# Altium PCB DXES101B-659637.PcbDoc (part 1 of 2)
Units mm, origin at the board's own origin, x right, y up, seen from the top; angles counter-clockwise.
Board outline 125 x 80 mm, 4 copper layers (Top Layer, Layer 1, Layer 2, Bottom Layer), stack 1.883 mm thick; 290 components, 208 nets, 784 pads, 192 vias.
Unrouted connection lines stored in the file: 554.
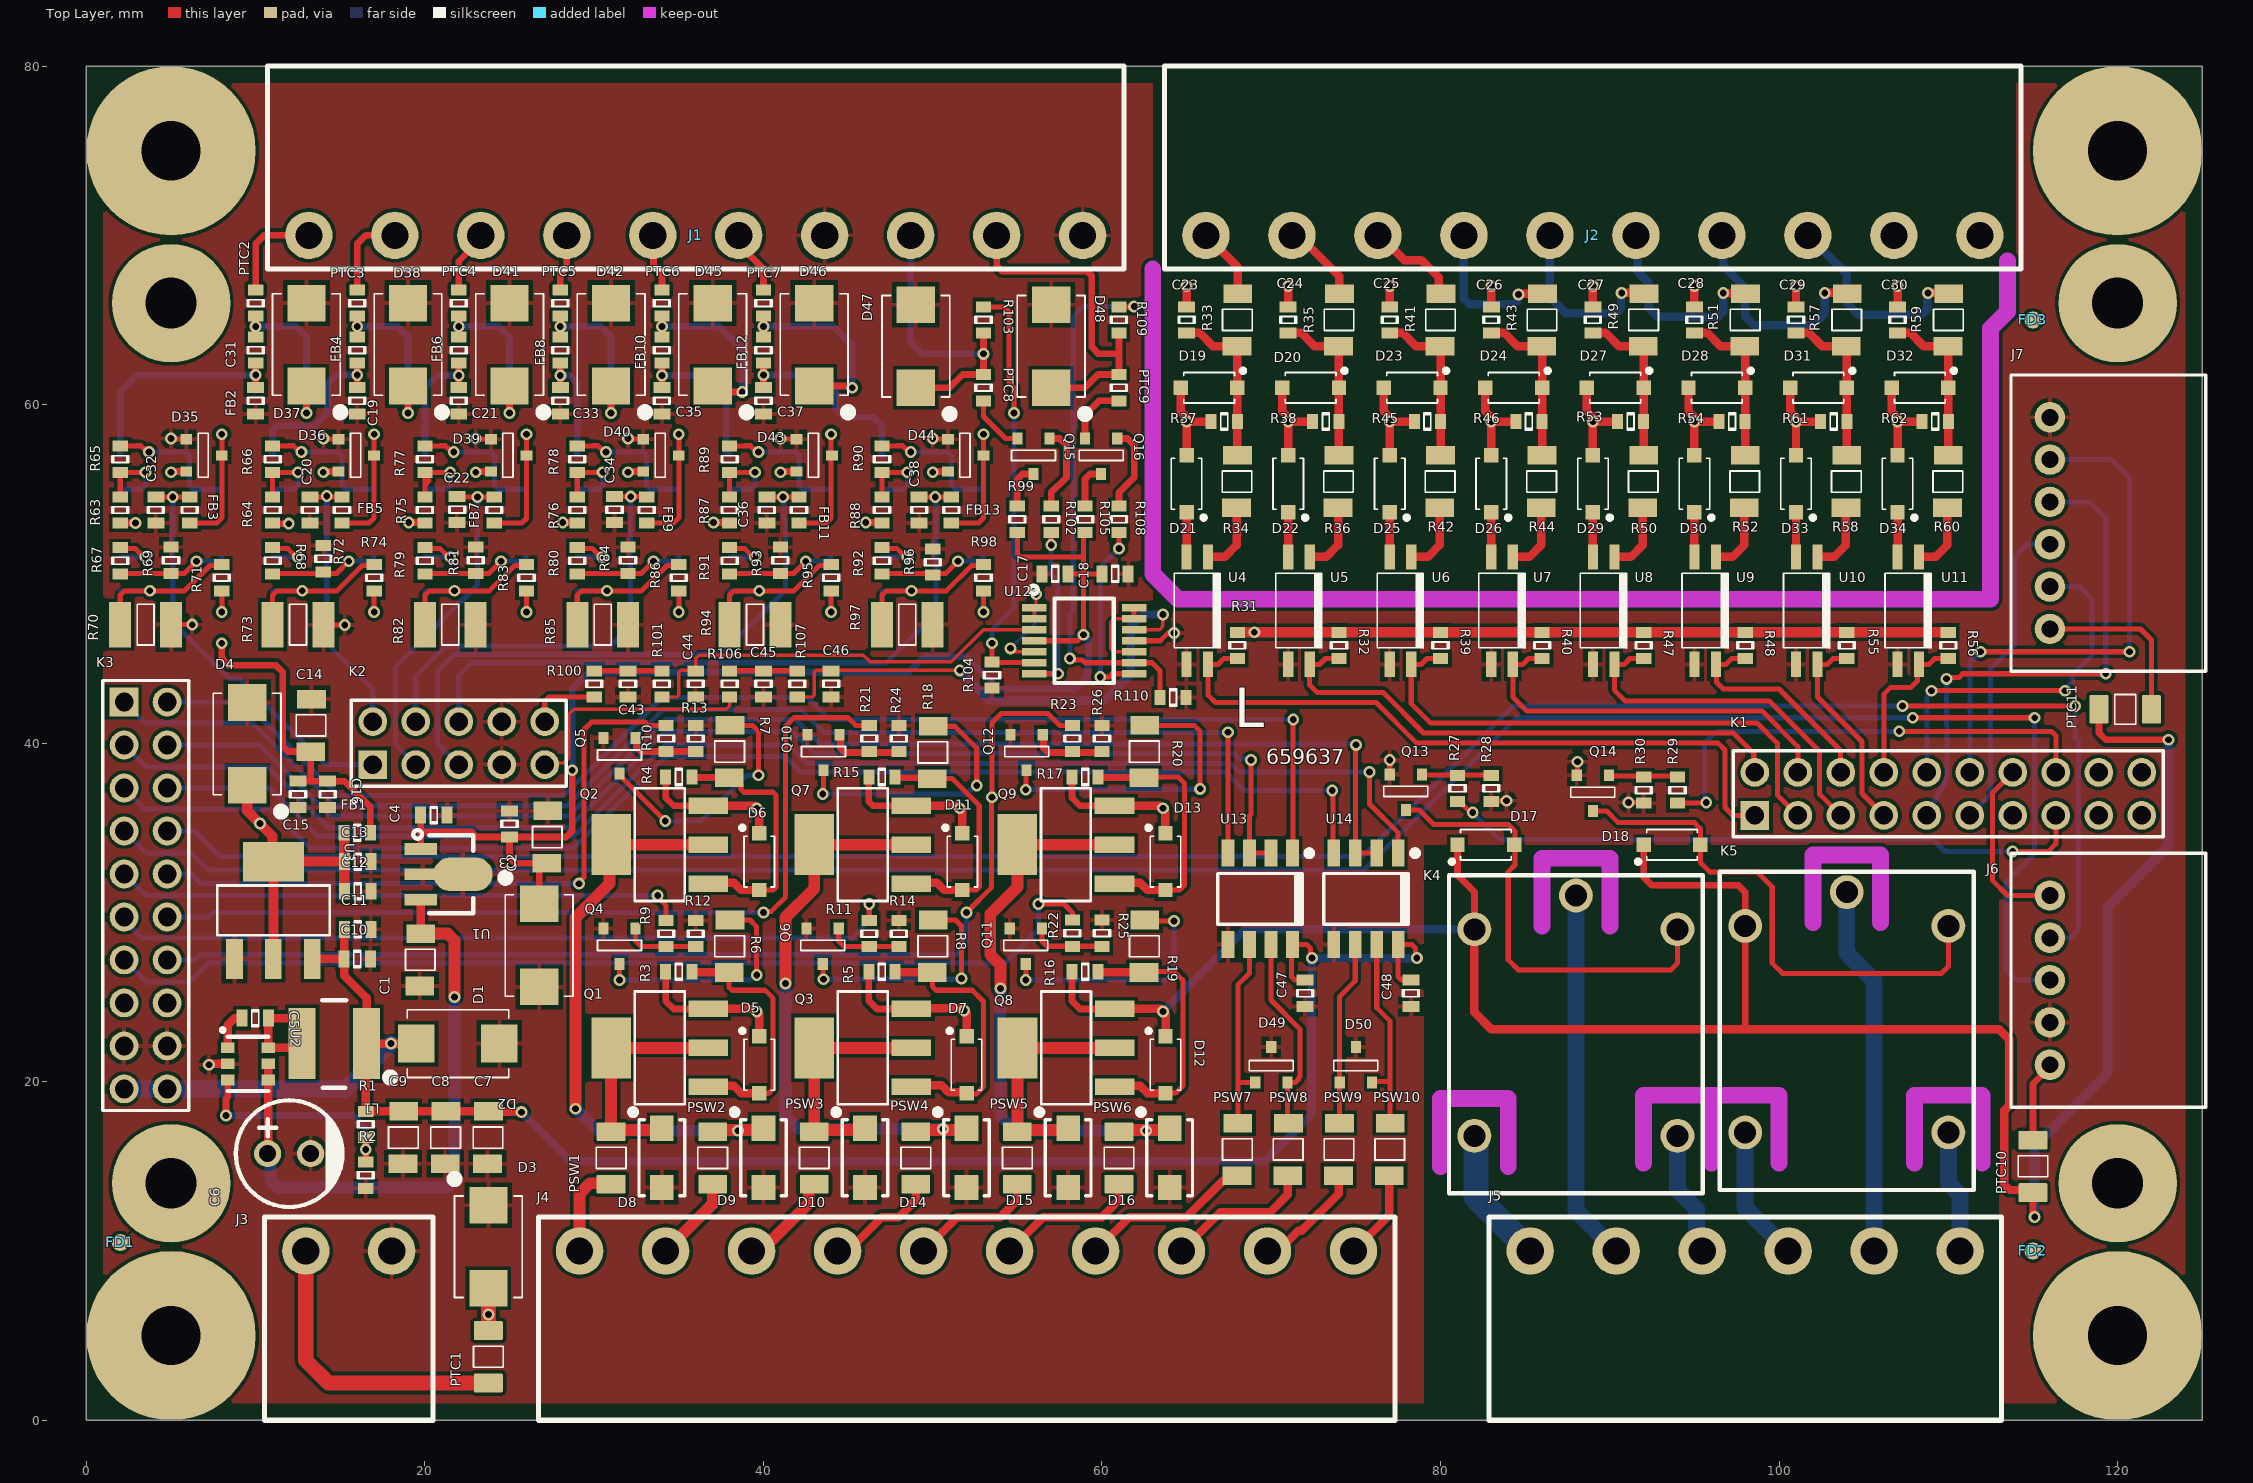
[diagram p0: Top Layer view]
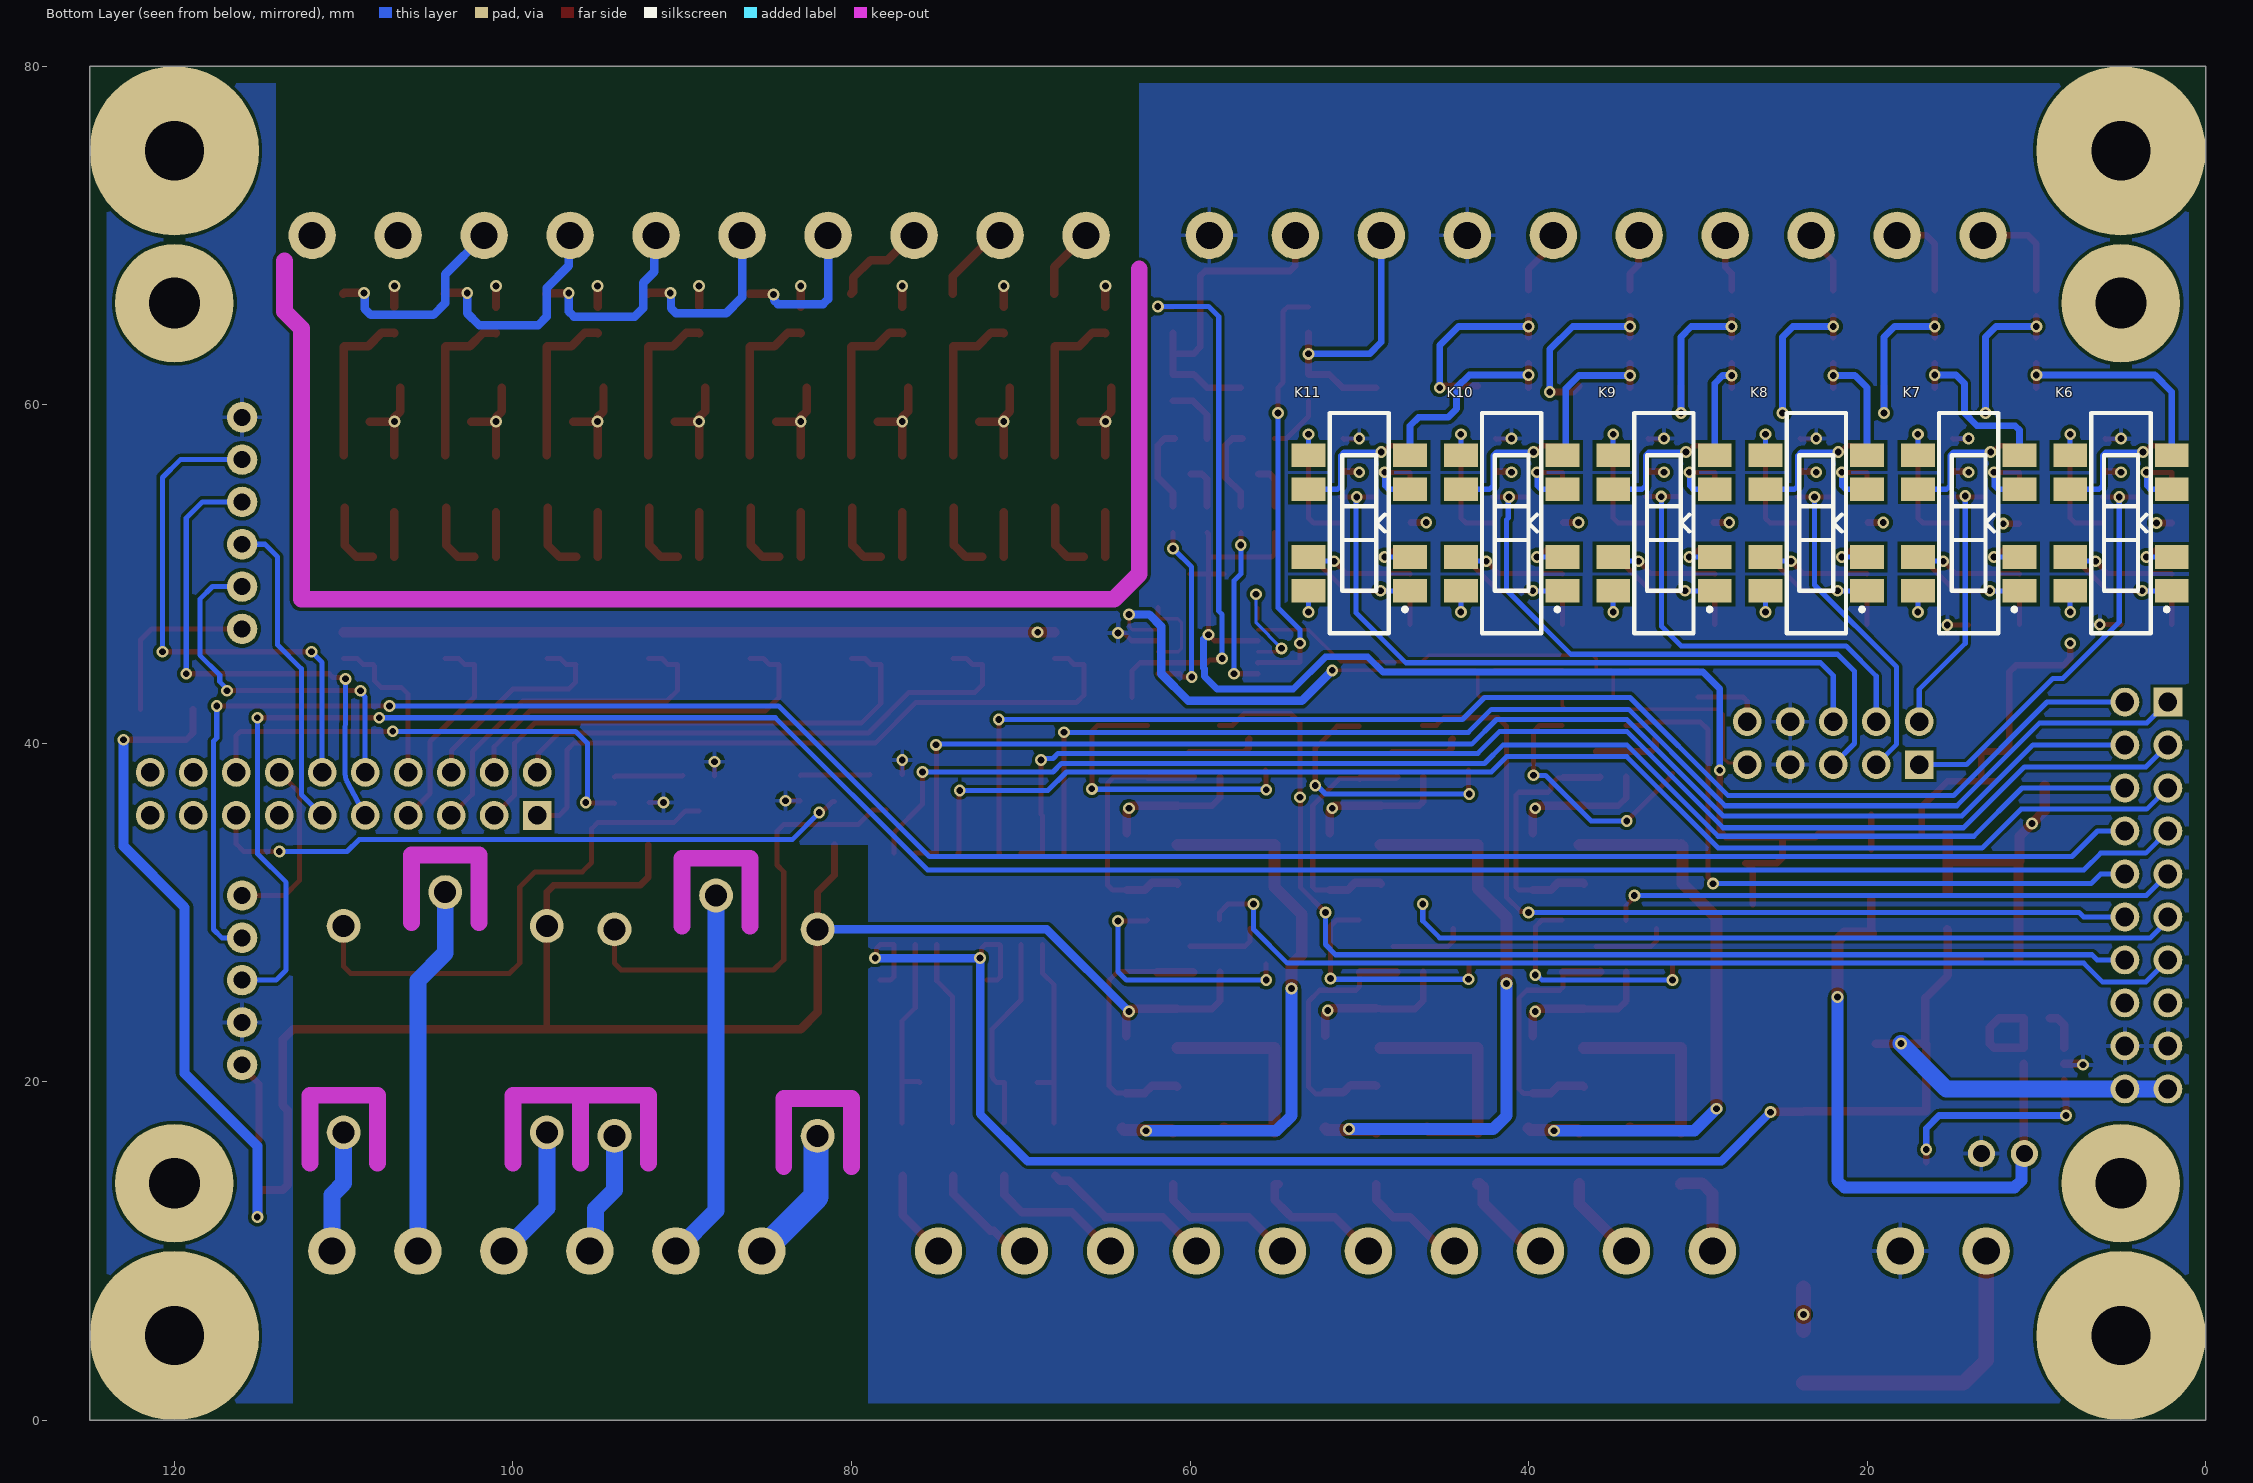
[diagram p1: Bottom Layer view, seen from below]
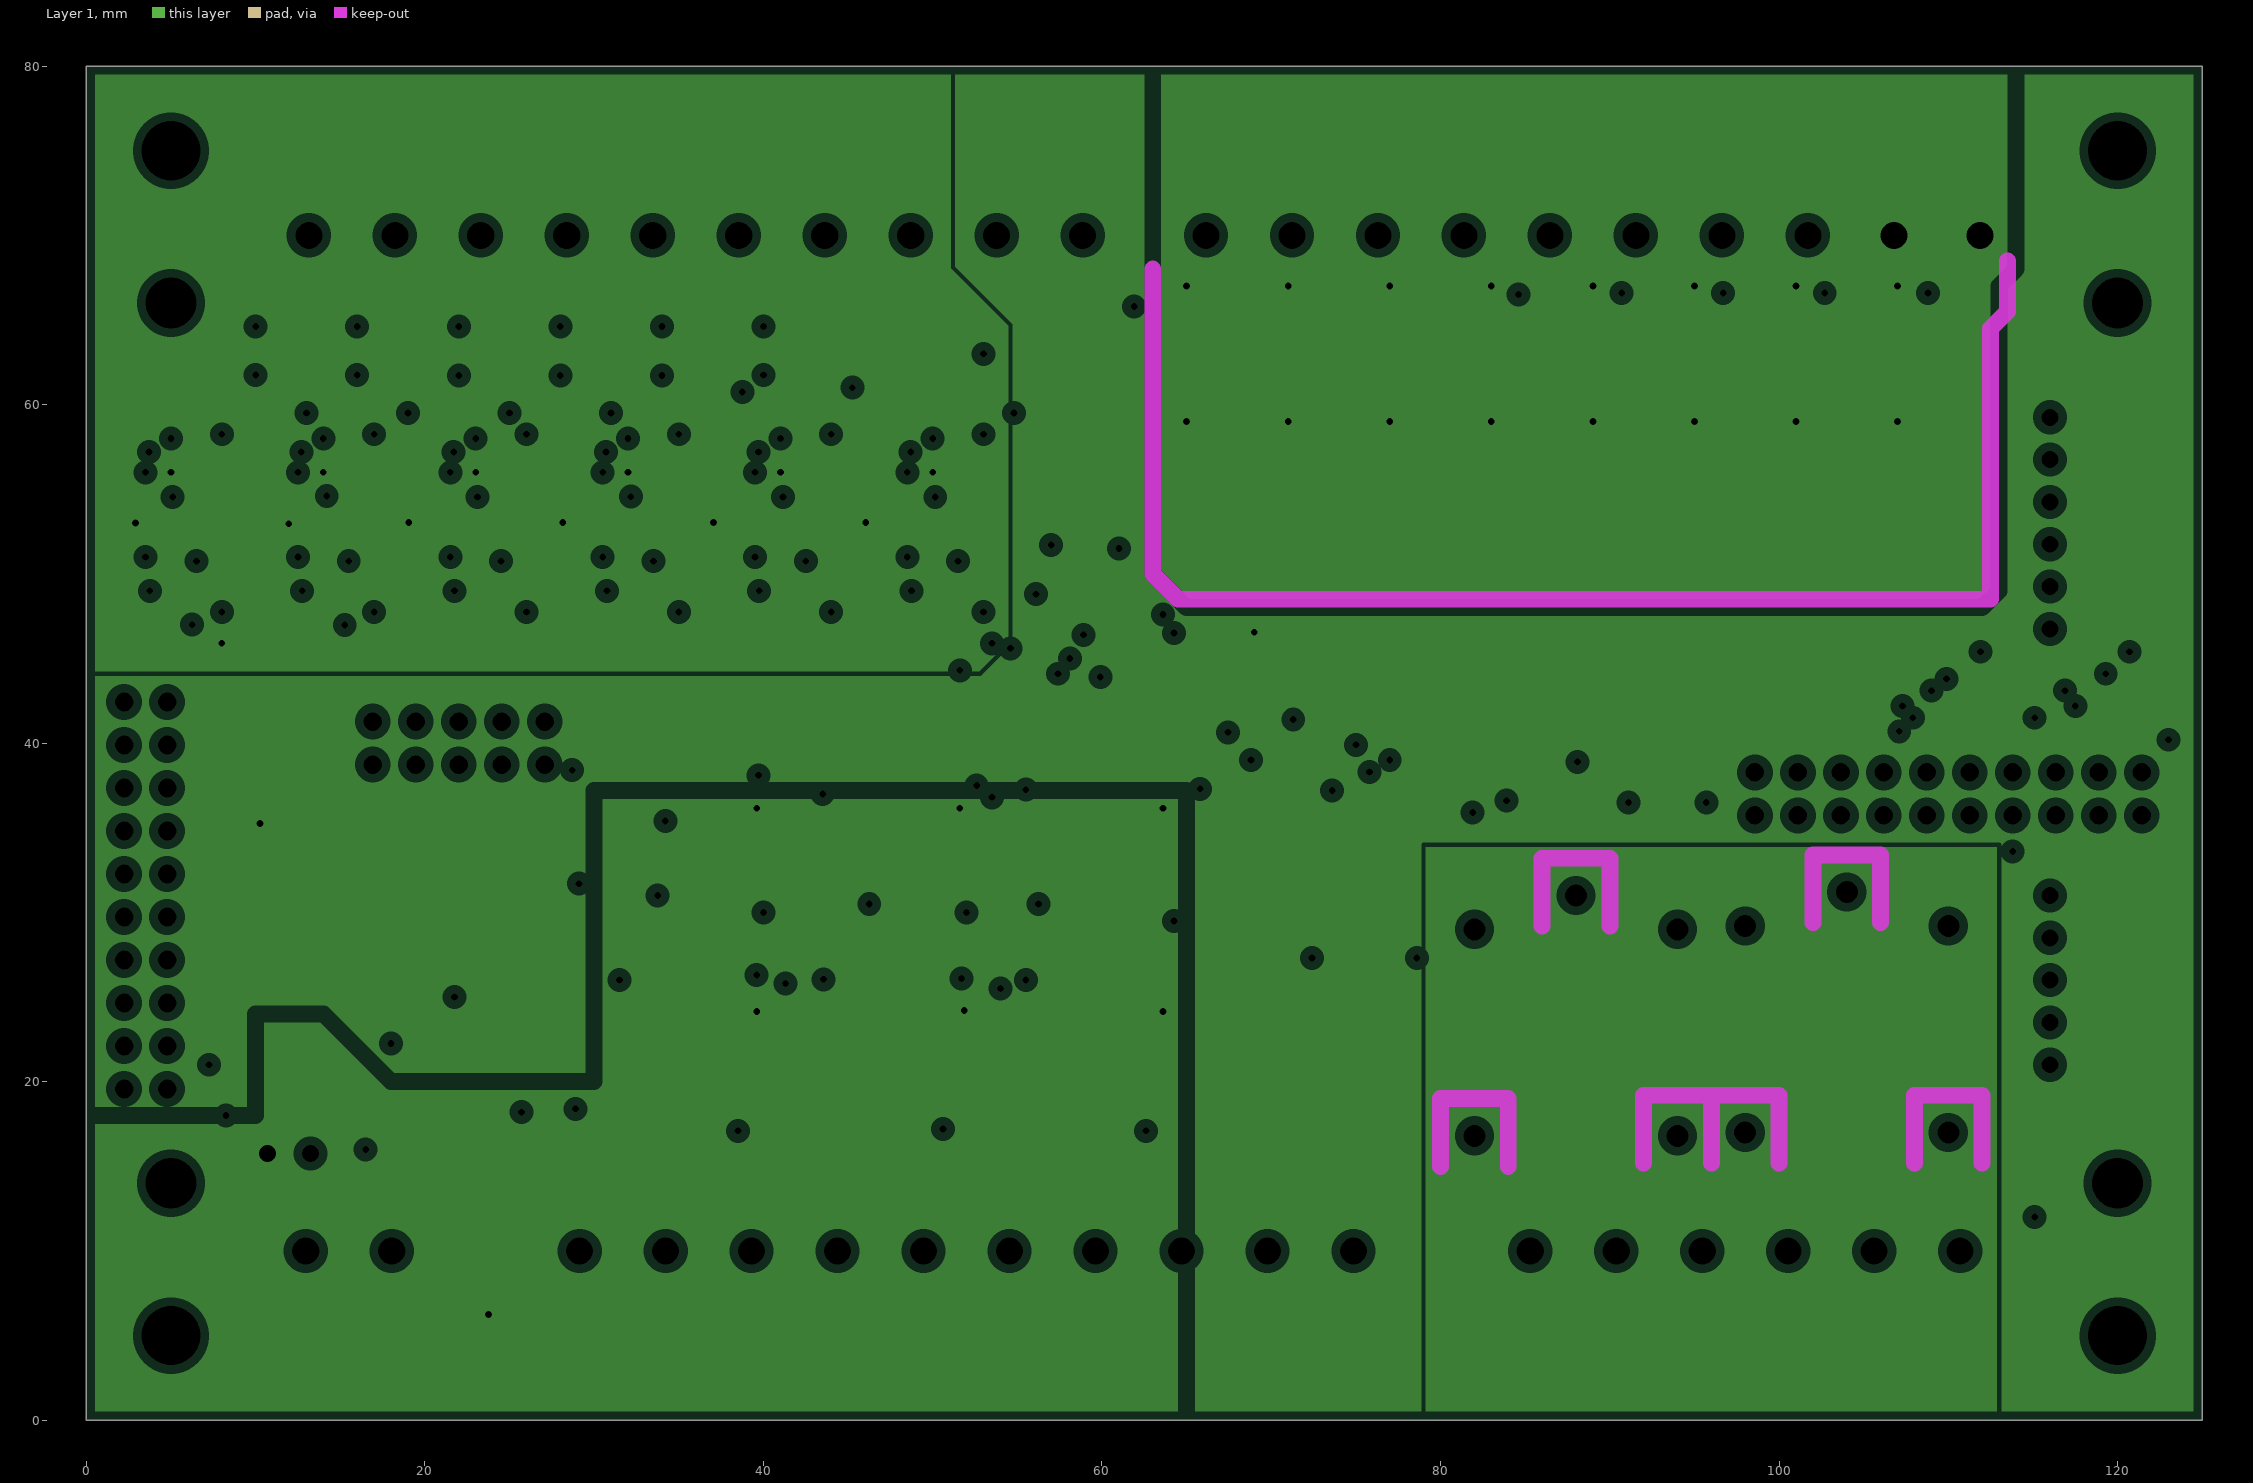
[diagram p2: Layer 1, clearances drawn from the general rule]
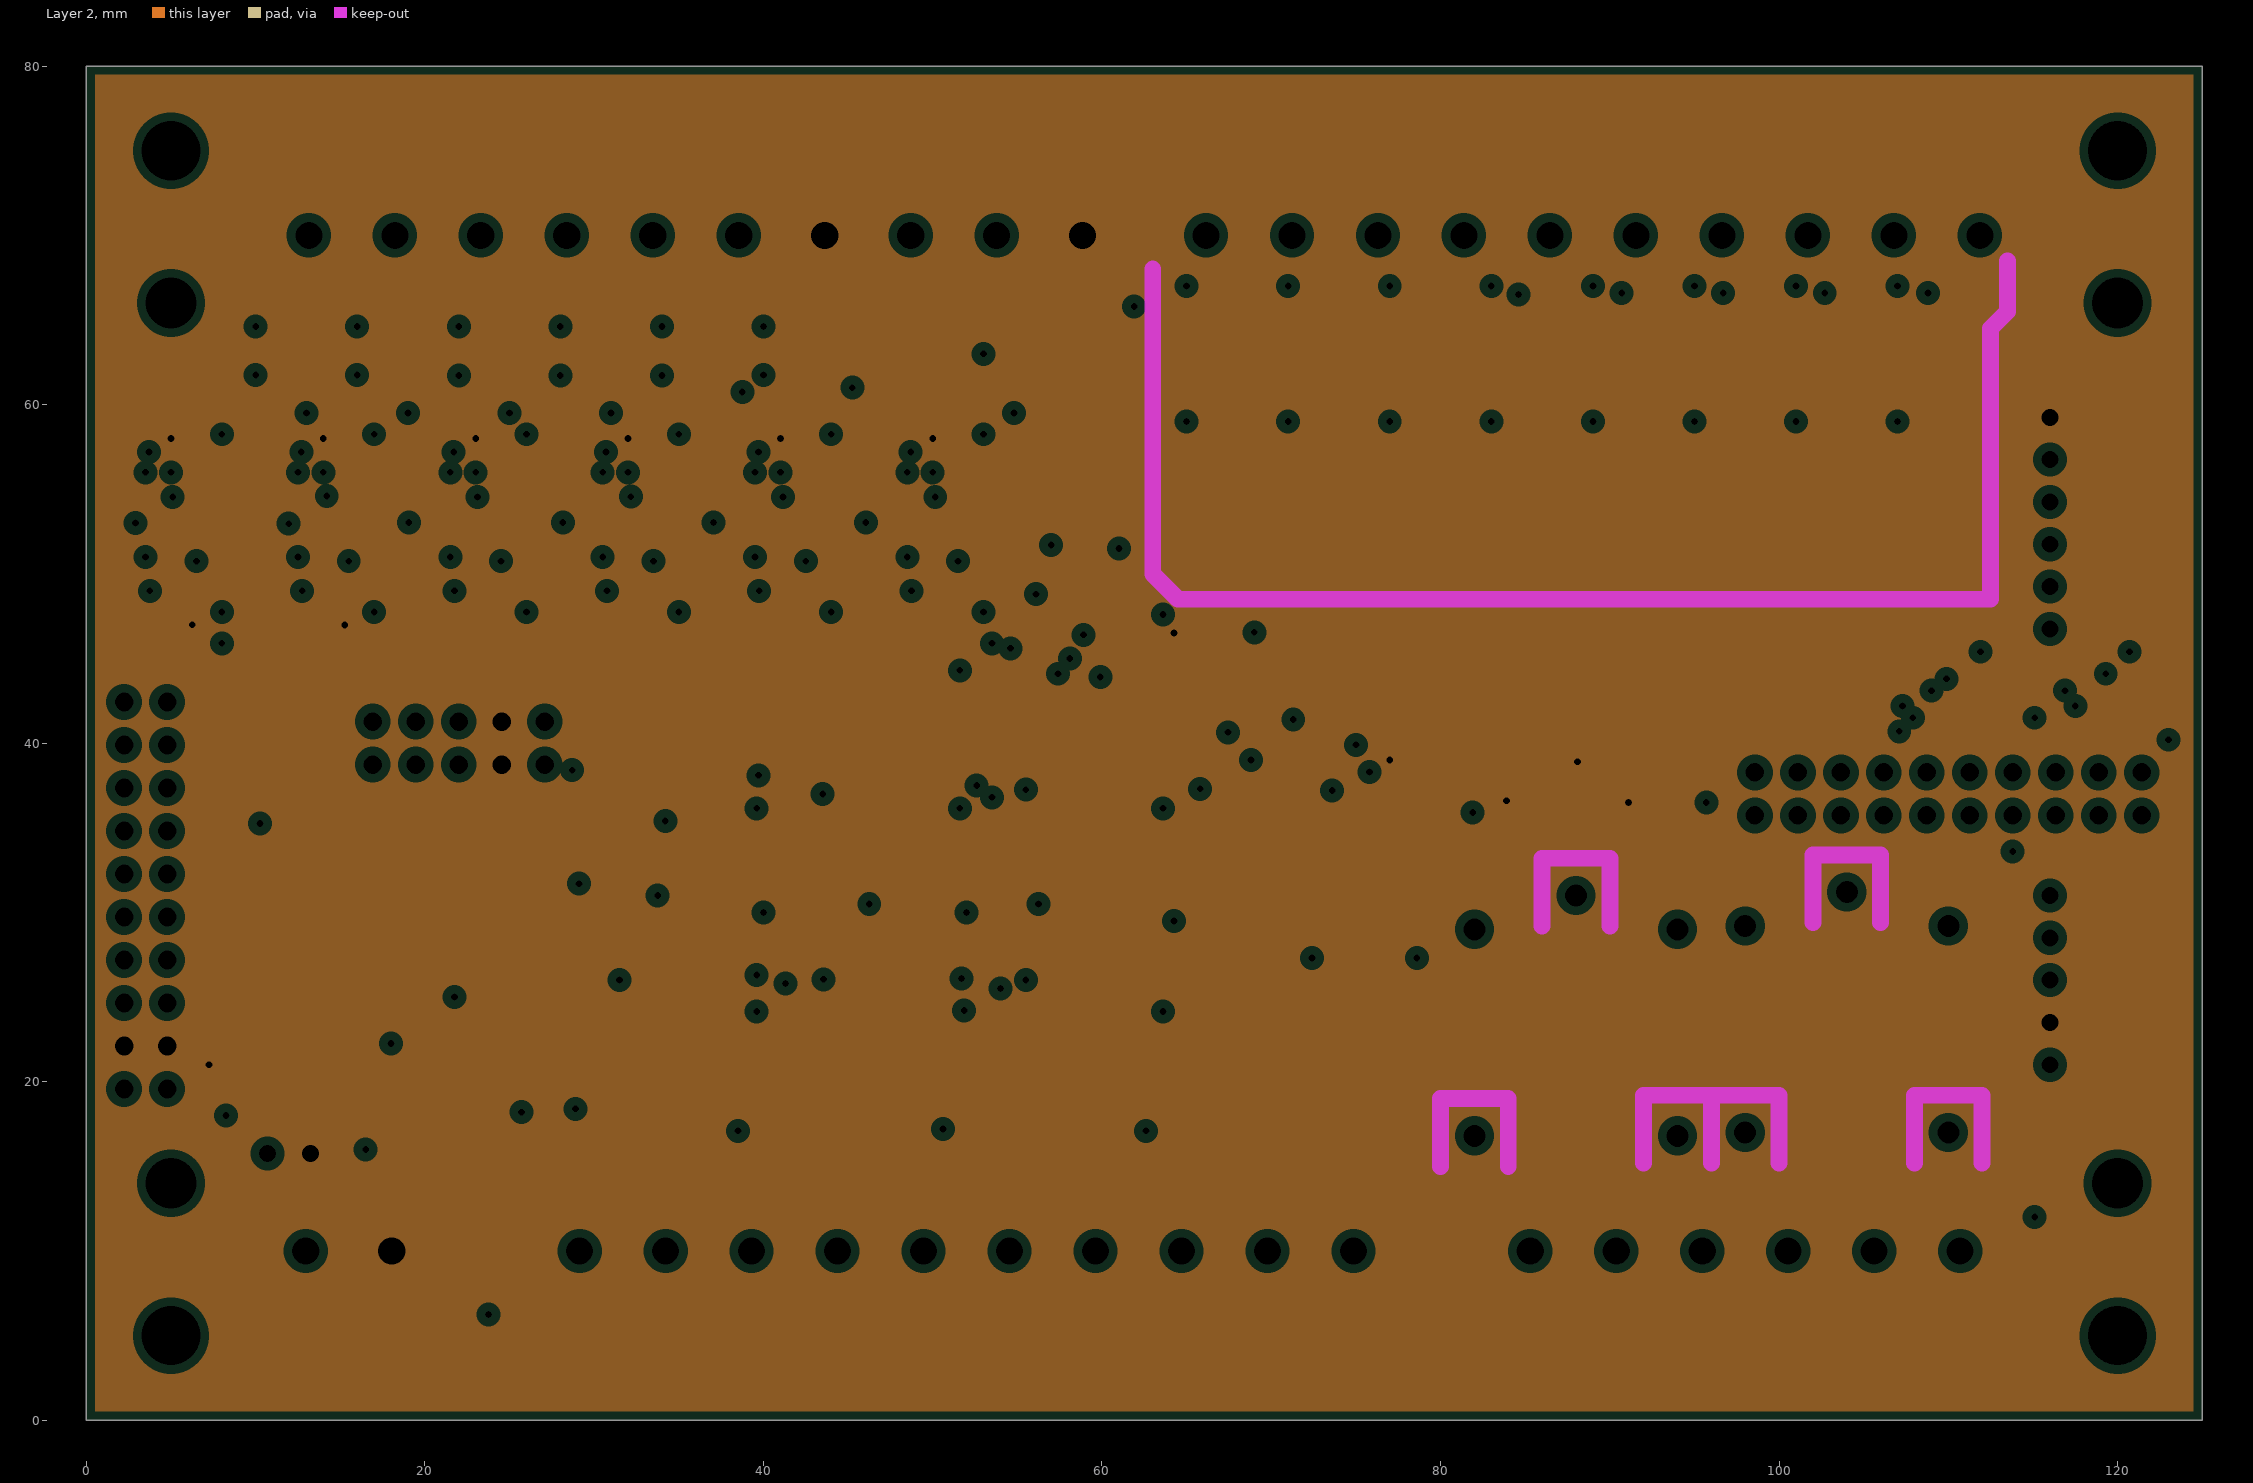
[diagram p3: Layer 2, clearances drawn from the general rule]
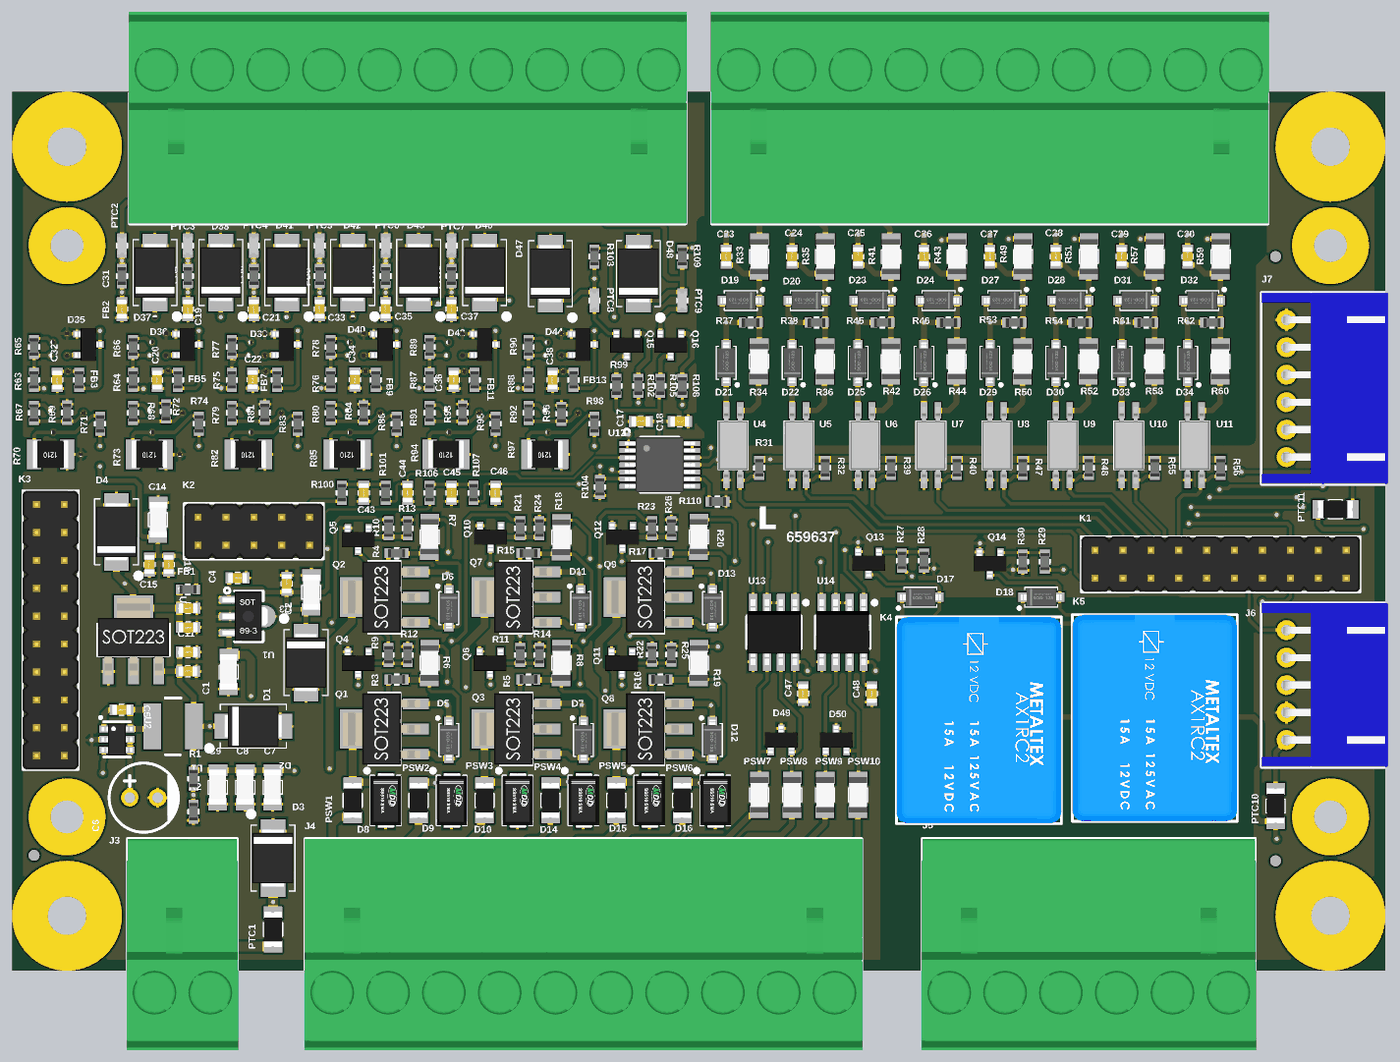
[diagram p5: 3D render of the assembled board from above, using the file's embedded part models]
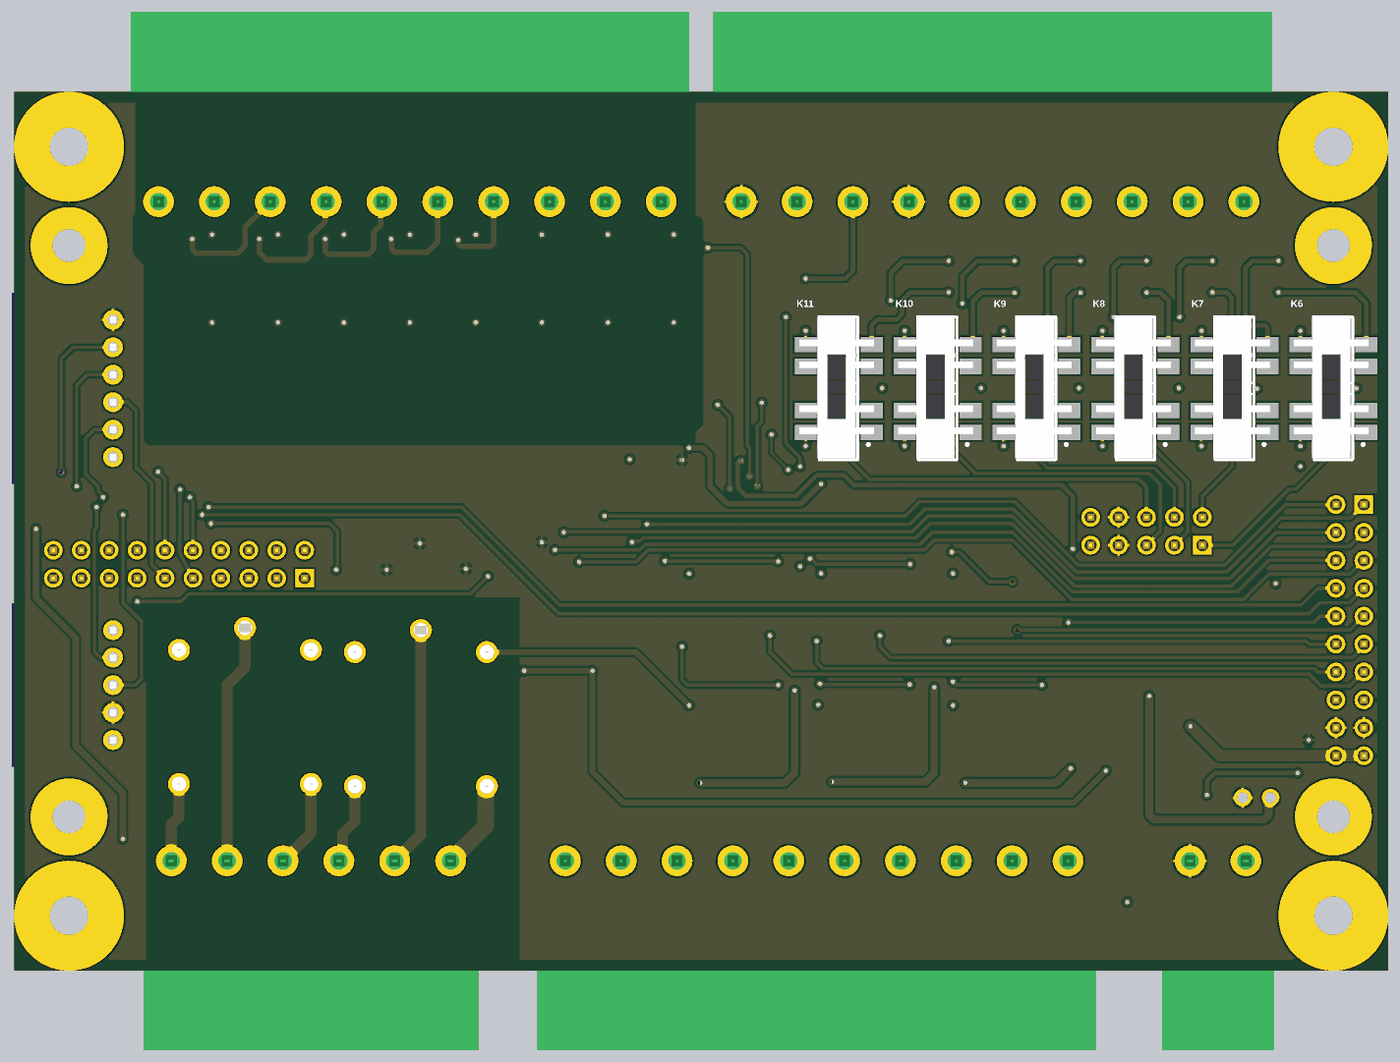
[diagram p6: 3D render of the assembled board from below, using the file's embedded part models]

## Layer stack, top to bottom
Top Solder: solder mask 0.0102, Solder Resist, Dk 3.5
Top Layer: signal copper 0.0356
Dielectric 2: prepreg 0.0711, PP-006, Dk 4.1
Layer 1: plane copper 0.035, net (Multiple Nets)
Dielectric 1: dielectric 1.6, FR-4, Dk 4.8
Layer 2: plane copper 0.035, net GND
Dielectric 3: prepreg 0.0711, PP-006, Dk 4.1
Bottom Layer: signal copper 0.0356
Bottom Solder: solder mask 0.0102, Solder Resist, Dk 3.5

## Board outline
0,0 0,80 125,80 125,0

## Design rules (kind name [scope] priority, off if disabled: settings)
BoardOutlineClearance [All] p1: gap=1 ignorepadtopadclearanceinfootprint=FALSE except(0: Arc-SplitContinuation Track-SplitContinuation SMDPad-SplitContinuation THPad-SplitContinuation Via-SplitContinuation Fill-SplitContinuation Poly-SplitContinuation Text-SplitContinuation)
Clearance [All] p1: gap=0.2 ignorepadtopadclearanceinfootprint=FALSE
ComponentClearance [All] p1: gap=0.254 collisioncheckmode=3 verticalgap=2540 showdistances=FALSE
PlaneClearance [All] p1: clearance=0.508
PlaneConnect [All] p1: planeconnectstyle=Relief reliefexpansion=0.508 reliefentries=4 reliefconductorwidth=0.254 reliefairgap=0.254
PolygonConnect [All] p1: connectstyle=Relief reliefconductorwidth=0.254 reliefentries=4 polygonreliefangle="90 Angle" airgapwidth=0.254
RoutingVias [All] p1: holewidth=0.4 width=0.7 viastyle="Through Hole" minholewidth=0.4 minwidth=0.7 maxholewidth=0.4 maxwidth=0.7
SolderMaskExpansion [All] p1: expansion=0.102 istentingtop=FALSE
SupplyNets "Schematic Supply Nets_7" [InNet('GND')] p1: voltage=0.000
SupplyNets "Schematic Supply Nets_6" [InNet('3,3VA')] p2: voltage=0.000
SupplyNets "Schematic Supply Nets_5" [InNet('5V')] p3: voltage=0.000
SupplyNets "Schematic Supply Nets_4" [InNet('VSYS')] p4: voltage=0.000
SupplyNets "Schematic Supply Nets_3" [InNet('GND_ISO')] p5: voltage=0.000
SupplyNets "Schematic Supply Nets_2" [InNet('VSYSIN')] p6: voltage=0.000
SupplyNets "Schematic Supply Nets_1" [InNet('3,3V')] p7: voltage=0.000
SupplyNets "Schematic Supply Nets" [InNet('15V')] p8: voltage=0.000
Width [All] p1: maxlimit=3 minlimit=0.2 preferedwidth=0.2
27 further rules are at their usual default settings.

## Classes and differential pairs
component class RELAY-OUTPUTS: D17 D18 K4 K5 Q13 Q14 R27 R28 R29 R30
component class MODEM_COMM_pORT: J7 PTC11
component class DXES101B-659637-GENERAL: J1 J2 J3 J4 J5
component class DIGITAL_OUTPUTS: D5 D6 D7 D8 D9 D10 D11 D12 D13 D14 D15 D16 PSW1 PSW2 PSW3 PSW4 PSW5 PSW6 Q1 Q2 Q3 Q4 Q5 Q6 Q7 Q8 Q9 Q10 Q11 Q12 R3 R4 R5 R6 R7 R8 R9 R10 R11 R12 R13 R14 R15 R16 R17 R18 R19 R20 R21 R22 R23 R24 R25 R26
component class DEXTRO_EXTBUS: J6 PTC10
component class Designator: C23 C24 C25 C26 C27 C28 C29 C30 D19 D20 D21 D22 D23 D24 D25 D26 D27 D28 D29 D30 D31 D32 D33 D34 R31 R32 R33 R34 R35 R36 R37 R38 R39 R40 R41 R42 R43 R44 R45 R46 R47 R48 R49 R50 R51 R52 R53 R54 R55 R56 R57 R58 R59 R60 R61 R62 U4 U5 U6 U7 U8 U9 U10 U11
component class CPU_HEADER: C1 C2 C3 C4 C5 C6 C7 C8 C9 C10 C11 C12 C13 C14 C15 C16 D1 D2 D3 D4 FB1 FD1 FD2 FD3 K1 K2 K3 L1 PTC1 R1 R2 U1 U2 U3
component class COMM_PORTS: C47 C48 D49 D50 PSW7 PSW8 PSW9 PSW10 U13 U14
component class ANALOG_OUTPUTS: C17 C18 C43 C44 C45 C46 D47 D48 PTC8 PTC9 Q15 Q16 R99 R100 R101 R102 R103 R104 R105 R106 R107 R108 R109 R110 U12
component class ANALOG_INPUTS: C19 C20 C21 C22 C31 C32 C33 C34 C35 C36 C37 C38 D35 D36 D37 D38 D39 D40 D41 D42 D43 D44 D45 D46 FB2 FB3 FB4 FB5 FB6 FB7 FB8 FB9 FB10 FB11 FB12 FB13 K6 K7 K8 K9 K10 K11 PTC2 PTC3 PTC4 PTC5 PTC6 PTC7 R63 R64 R65 R66 R67 R68 R69 R70 R71 R72 R73 R74 R75 R76 R77 R78 R79 R80 R81 R82 R83 R84 R85 R86 R87 R88 R89 R90 R91 R92 R93 R94 R95 R96 R97 R98

## Components (designator, comment, footprint, x,y, rotation, side; value= is the part's Value field where it differs from the comment)
C1 "22uF/25V" CAP-1206 19.725,27.2 r90 top
C2 "22uF/25V" CAP-1206 27.225,34.45 r270 top
C3 "10uF/16V" CAP-0603 25,35.225 r270 top
C4 "10uF/16V" CAP-0603 20.525,35.75 r180 top
C5 "100nF/50V" CAP-0603 9.975,23.75 r180 top
C6 "100uF/35V" CAP-TH_BD6.3-P2.50-D1.0-FD 11.98,15.75 r0 top
C7 "22uF/25V" CAP-1206 23.725,16.7 r90 top
C8 "22uF/25V" CAP-1206 21.225,16.7 r90 top
C9 "22uF/25V" CAP-1206 18.725,16.7 r90 top
C10 "10uF/16V" CAP-0603 16,27.25 r180 top
C11 "100nF/50V" CAP-0603 16.025,29 r180 top
C12 "10uF/16V" CAP-0603 16.025,31.25 r180 top
C13 "100nF/50V" CAP-0603 16.025,33 r180 top
C14 "22uF/25V" CAP-1206 13.275,41.05 r270 top
C15 "10uF/16V" CAP-0603 12.5,36.975 r90 top
C16 "100nF/50V" CAP-0603 14.25,36.975 r90 top
C17 "10uF/16V" CAP-0603 57.225,50 r0 top
C18 "100nF/50V" CAP-0603 60.775,50 r180 top
C19 "100nF/50V" CAP-0603 16,60.225 r90 top
C20 "100nF/50V" CAP-0603 13.2,53.775 r90 top
C21 "100nF/50V" CAP-0603 22,60.225 r90 top
C22 "100nF/50V" CAP-0603 21.9,53.8 r90 top
C23 "100nF/50V" CAP-0603 65,65 r270 top
C24 "100nF/50V" CAP-0603 71,65 r270 top
C25 "100nF/50V" CAP-0603 77,65 r270 top
C26 "100nF/50V" CAP-0603 83,65 r270 top
C27 "100nF/50V" CAP-0603 89,65 r270 top
C28 "100nF/50V" CAP-0603 95,65 r270 top
C29 "100nF/50V" CAP-0603 101,65 r270 top
C30 "100nF/50V" CAP-0603 107,65 r270 top
C31 "100nF/50V" CAP-0603 10,60.225 r90 top
C32 "100nF/50V" CAP-0603 4.1,53.775 r90 top
C33 "100nF/50V" CAP-0603 28,60.225 r90 top
C34 "100nF/50V" CAP-0603 31.2,53.8 r90 top
C35 "100nF/50V" CAP-0603 34,60.225 r90 top
C36 "100nF/50V" CAP-0603 40.2,53.775 r90 top
C37 "100nF/50V" CAP-0603 40,60.225 r90 top
C38 "100nF/50V" CAP-0603 49.2,53.775 r90 top
C43 "100nF/50V" CAP-0603 32,43.5 r90 top
C44 "220F/50V" CAP-0603 36,43.5 r90 top
C45 "100nF/50V" CAP-0603 40,43.5 r90 top
C46 "220F/50V" CAP-0603 44,43.5 r90 top
C47 "100nF/50V" CAP-0603 72,25.225 r90 top
C48 "100nF/50V" CAP-0603 78.25,25.225 r90 top
D1 "SMBJ15CA" DO214-AA 26.75,28.05 r90 top
D2 "SMBJ5.0A" DO214-AA 21.95,22.25 r180 top
D3 "SMBJ33CA" DO214-AA 23.75,10.25 r90 top
D4 "SMBJ5.0A" DO214-AA 9.5,39.95 r270 top
D5 "BZT52C5V1" SOD123 39.75,21 r90 top
D6 "BZT52C5V1" SOD123 39.75,33 r90 top
D7 "BZT52C5V1" SOD123 52,21 r90 top
D8 "1N4007-M7" SMA 34,15.5 r90 top
D9 "1N4007-M7" SMA 40,15.5 r90 top
D10 "1N4007-M7" SMA 46,15.5 r90 top
D11 "BZT52C5V1" SOD123 51.75,33 r90 top
D12 "BZT52C5V1" SOD123 63.75,21 r90 top
D13 "BZT52C5V1" SOD123 63.75,33 r90 top
D14 "1N4007-M7" SMA 52,15.5 r90 top
D15 "1N4007-M7" SMA 58,15.5 r90 top
D16 "1N4007-M7" SMA 64,15.5 r90 top
D17 "1N4148" SOD123 82.675,34 r180 top
D18 "1N4148" SOD123 93.675,34 r180 top
D19 "1N4148" SOD123 66.325,61 r0 top
D20 "1N4148" SOD123 72.325,61 r0 top
D21 "BZT52C5V1" SOD123 65,55.325 r270 top
D22 "BZT52C5V1" SOD123 71,55.325 r270 top
D23 "1N4148" SOD123 78.325,61 r0 top
D24 "1N4148" SOD123 84.325,61 r0 top
D25 "BZT52C5V1" SOD123 77,55.325 r270 top
D26 "BZT52C5V1" SOD123 83,55.325 r270 top
D27 "1N4148" SOD123 90.325,61 r0 top
D28 "1N4148" SOD123 96.325,61 r0 top
D29 "BZT52C5V1" SOD123 89,55.325 r270 top
D30 "BZT52C5V1" SOD123 95,55.325 r270 top
D31 "1N4148" SOD123 102.325,61 r0 top
D32 "1N4148" SOD123 108.325,61 r0 top
D33 "BZT52C5V1" SOD123 101,55.325 r270 top
D34 "BZT52C5V1" SOD123 107,55.325 r270 top
D35 "BAT54S" SOT23-3 6.95,57 r270 top
D36 "BAT54S" SOT23-3 15.95,57 r270 top
D37 "SMBJ33CA" DO214-AA 13,63.55 r270 top
D38 "SMBJ33CA" DO214-AA 19,63.55 r270 top
D39 "BAT54S" SOT23-3 24.95,57 r270 top
D40 "BAT54S" SOT23-3 33.95,57 r270 top
D41 "SMBJ33CA" DO214-AA 25,63.55 r270 top
D42 "SMBJ33CA" DO214-AA 31,63.55 r270 top
D43 "BAT54S" SOT23-3 43,57 r270 top
D44 "BAT54S" SOT23-3 51.95,57 r270 top
D45 "SMBJ33CA" DO214-AA 37,63.55 r270 top
D46 "SMBJ33CA" DO214-AA 43,63.55 r270 top
D47 "SMBJ15CA" DO214-AA 49,63.45 r270 top
D48 "SMBJ15CA" DO214-AA 57,63.45 r270 top
D49 "SM712.TCT-ES" SOT23-3 70,21 r0 top
D50 "SM712.TCT-ES" SOT23-3 75,21 r0 top
FB1 "BLM18PG121SN1D" RES-0603 16,34.7 r0 top
FB2 "BLM18PG121SN1D" RES-0603 10,63.225 r270 top
FB3 "BLM18PG121SN1D" RES-0603 6.1,53.775 r90 top
FB4 "BLM18PG121SN1D" RES-0603 16,63.225 r270 top
FB5 "BLM18PG121SN1D" RES-0603 15.1,53.775 r90 top
FB6 "BLM18PG121SN1D" RES-0603 22,63.225 r270 top
FB7 "BLM18PG121SN1D" RES-0603 24.1,53.775 r90 top
FB8 "BLM18PG121SN1D" RES-0603 28,63.225 r270 top
FB9 "BLM18PG121SN1D" RES-0603 33.1,53.775 r90 top
FB10 "BLM18PG121SN1D" RES-0603 34,63.225 r270 top
FB11 "BLM18PG121SN1D" RES-0603 42.1,53.775 r90 top
FB12 "BLM18PG121SN1D" RES-0603 40,63.225 r270 top
FB13 "BLM18PG121SN1D" RES-0603 51.1,53.775 r90 top
FD1 "FIDUCIAL" FIDUCIAL 2,10.5 r90 top
FD2 "FIDUCIAL" FIDUCIAL 115,10 r90 top
FD3 "FIDUCIAL" FIDUCIAL 115,65 r90 top
J1 "STLZ950/10G-5.08-H-GREEN" STLZ950-10G-H 36,70 r180 top locked
J2 "STLZ950/10G-5.08-H-GREEN" STLZ950-10G-H 89,70 r180 top locked
J3 "STLZ950/2G-5.08-H-GREEN" STLZ950-02G-H 15.5,10 r0 top
J4 "STLZ950/10G-5.08-H-GREEN" STLZ950-10G-H 52,10 r0 top locked
J5 "STLZ950/6G-5.08-H-GREEN" STLZ950-06G-H 98,10 r0 top locked
J6 "PEMN1-05" PEMN1-05 116,26 r90 top locked
J7 "PEMN1-04" PEMN1-06 116,53 r90 top locked
K1 "BPDDI-30MM-20" BPDDI-30MM-20 110,37 r90 top
K2 "BPDDI-30MM-10" BPDDI-30MM-10 22,40 r90 top locked
K3 "BPDDI-30MM-20" BPDDI-30MM-20 3.5,31 r0 top
K4 "AX1RC3" AX1RCX 88,31 r0 top
K5 "AX1RC3" AX1RCX 104,31.2 r0 top
K6 "MST-23D18G2-BD" SW-SMD_SHOU_MST23D18G2 5,53 r90 bottom locked
K7 "MST-23D18G2-BD" SW-SMD_SHOU_MST23D18G2 14,53 r90 bottom locked
K8 "MST-23D18G2-BD" SW-SMD_SHOU_MST23D18G2 23,53 r90 bottom locked
K9 "MST-23D18G2-BD" SW-SMD_SHOU_MST23D18G2 32,53 r90 bottom locked
K10 "MST-23D18G2-BD" SW-SMD_SHOU_MST23D18G2 41,53 r90 bottom locked
K11 "MST-23D18G2-BD" SW-SMD_SHOU_MST23D18G2 50,53 r90 bottom locked
L1 "10uh" IND-SMD_2P-L5.0-W5.0 14.65,22.25 r0 top
PSW1 "ASMD1206H020" PTC-1206 31,15.5 r270 top
PSW2 "ASMD1206H020" PTC-1206 37,15.5 r270 top
PSW3 "ASMD1206H020" PTC-1206 43,15.5 r270 top
PSW4 "ASMD1206H020" PTC-1206 49,15.5 r270 top
PSW5 "ASMD1206H020" PTC-1206 55,15.5 r270 top
PSW6 "ASMD1206H020" PTC-1206 61,15.5 r270 top
PSW7 "SMD1206B010TF" RES-1206 68,16 r270 top
PSW8 "SMD1206B010TF" RES-1206 71,16 r270 top
PSW9 "SMD1206B010TF" RES-1206 74,16 r270 top
PSW10 "SMD1206B010TF" RES-1206 77,16 r270 top
PTC1 "JK-nSMD050-30" PTC-1206 23.75,3.75 r90 top
PTC2 "BSMD0603-001-60V" PTC-0603 10,66 r270 top
PTC3 "BSMD0603-001-60V" PTC-0603 16,66 r270 top
PTC4 "BSMD0603-001-60V" PTC-0603 22,66 r270 top
PTC5 "BSMD0603-001-60V" PTC-0603 28,66 r270 top
PTC6 "BSMD0603-001-60V" PTC-0603 34,66 r270 top
PTC7 "BSMD0603-001-60V" PTC-0603 40,66 r270 top
PTC8 "BSMD0603-001-60V" PTC-0603 53,61 r270 top
PTC9 "BSMD0603-001-60V" PTC-0603 61,61 r270 top
PTC10 "JK-nSMD050-30" PTC-1206 115,15 r270 top
PTC11 "JK-nSMD050-30" PTC-1206 120.45,42 r180 top
Q1 "HT03P700S" SOT-223-3_L6.7-W3.7-P2.30-LS7.0-BR_2 33.87,22 r0 top
Q2 "HT03P700S" SOT-223-3_L6.7-W3.7-P2.30-LS7.0-BR_2 33.87,34 r0 top
Q3 "HT03P700S" SOT-223-3_L6.7-W3.7-P2.30-LS7.0-BR_2 45.87,22 r0 top
Q4 "BC846" SOT23-3 31.5,28 r180 top
Q5 "BC846" SOT23-3 31.5,39.25 r180 top
Q6 "BC846" SOT23-3 43.5,28 r180 top
Q7 "HT03P700S" SOT-223-3_L6.7-W3.7-P2.30-LS7.0-BR_2 45.87,34 r0 top
Q8 "HT03P700S" SOT-223-3_L6.7-W3.7-P2.30-LS7.0-BR_2 57.88,22 r0 top
Q9 "HT03P700S" SOT-223-3_L6.7-W3.7-P2.30-LS7.0-BR_2 57.87,34 r0 top
Q10 "BC846" SOT23-3 43.55,39.45 r180 top
Q11 "BC846" SOT23-3 55.5,28 r180 top
Q12 "BC846" SOT23-3 55.55,39.45 r180 top
Q13 "BC846" SOT23-3 77.951,37.099 r180 top
Q14 "BC846" SOT23-3 89,37.05 r180 top
Q15 "BC846" SOT23-3 55.95,56.95 r180 top
Q16 "BC846" SOT23-3 59.95,56.95 r180 top
R1 "69.8K" RES-0603 16.5,17.475 r90 top
R2 "9.53K" RES-0603 16.5,14.475 r90 top
R3 "100K" RES-0603 35,26.5 r180 top
R4 "100K" RES-0603 35,38 r180 top
R5 "100K" RES-0603 47,26.5 r180 top
R6 "2K" RES-1206 38,28 r270 top
R7 "2K" RES-1206 38,39.5 r270 top
R8 "2K" RES-1206 50,28 r270 top
R9 "10K" RES-0603 34.25,28.75 r90 top
R10 "10K" RES-0603 34.25,40.275 r90 top
R11 "10K" RES-0603 46.25,28.75 r90 top
R12 "10K" RES-0603 36,28.75 r270 top
R13 "10K" RES-0603 36,40.275 r270 top
R14 "10K" RES-0603 48,28.75 r270 top
R15 "100K" RES-0603 47,38 r180 top
R16 "100K" RES-0603 59,26.5 r180 top
R17 "100K" RES-0603 59,38 r180 top
R18 "2K" RES-1206 50,39.45 r270 top
R19 "2K" RES-1206 62.5,28 r270 top
R20 "2K" RES-1206 62.5,39.5 r270 top
R21 "10K" RES-0603 46.25,40.275 r90 top
R22 "10K" RES-0603 58.25,28.775 r90 top
R23 "10K" RES-0603 58.25,40.275 r90 top
R24 "10K" RES-0603 48,40.275 r270 top
R25 "10K" RES-0603 60,28.775 r270 top
R26 "10K" RES-0603 60,40.275 r270 top
R27 "1K" RES-0603 81,37.325 r90 top
R28 "10K" RES-0603 83,37.325 r270 top
R29 "1K" RES-0603 94,37.225 r90 top
R30 "10K" RES-0603 92,37.225 r270 top
R31 "2K" RES-0603 68,45.775 r90 top
R32 "2K" RES-0603 74,45.775 r90 top
R33 "2K" RES-1206 68,65 r270 top
R34 "2K" RES-1206 67.975,55.45 r270 top
R35 "2K" RES-1206 74,65 r270 top
R36 "2K" RES-1206 73.975,55.45 r270 top
R37 "10K" RES-0603 67.225,59 r0 top
R38 "10K" RES-0603 73.225,59 r0 top
R39 "2K" RES-0603 80,45.775 r90 top
R40 "2K" RES-0603 86,45.775 r90 top
R41 "2K" RES-1206 80,65 r270 top
R42 "2K" RES-1206 79.975,55.45 r270 top
R43 "2K" RES-1206 86,65 r270 top
R44 "2K" RES-1206 85.975,55.45 r270 top
R45 "10K" RES-0603 79.225,59 r0 top
R46 "10K" RES-0603 85.225,59 r0 top
R47 "2K" RES-0603 92,45.775 r90 top
R48 "2K" RES-0603 98,45.775 r90 top
R49 "2K" RES-1206 92,65 r270 top
R50 "2K" RES-1206 91.975,55.45 r270 top
R51 "2K" RES-1206 98,65 r270 top
R52 "2K" RES-1206 97.975,55.45 r270 top
R53 "10K" RES-0603 91.225,59 r0 top
R54 "10K" RES-0603 97.225,59 r0 top
R55 "2K" RES-0603 104,45.775 r90 top
R56 "2K" RES-0603 110,45.775 r90 top
R57 "2K" RES-1206 104,65 r270 top
R58 "2K" RES-1206 103.975,55.45 r270 top
R59 "2K" RES-1206 110,65 r270 top
R60 "2K" RES-1206 109.975,55.45 r270 top
R61 "10K" RES-0603 103.225,59 r0 top
R62 "10K" RES-0603 109.225,59 r0 top
R63 "10K" RES-0603 2,53.775 r270 top
R64 "10K" RES-0603 11,53.775 r270 top
R65 "10K" RES-0603 2,56.775 r90 top
R66 "10K" RES-0603 11,56.775 r90 top
R67 "27K" RES-0603 2,50.775 r90 top
R68 "27K" RES-0603 11,50.775 r90 top
R69 "10K" RES-0603 5,50.8 r90 top
R70 "150R" RES-1210 3.5,47 r180 top
R71 "10K" RES-0603 8,49.775 r270 top
R72 "10K" RES-0603 14,50.9 r90 top
R73 "150R" RES-1210 12.5,47 r180 top
R74 "10K" RES-0603 17,49.775 r270 top
R75 "10K" RES-0603 20,53.775 r270 top
R76 "10K" RES-0603 29,53.775 r270 top
R77 "10K" RES-0603 20,56.775 r90 top
R78 "10K" RES-0603 29,56.775 r90 top
R79 "27K" RES-0603 20,50.775 r90 top
R80 "27K" RES-0603 29,50.775 r90 top
R81 "10K" RES-0603 23,50.8 r90 top
R82 "150R" RES-1210 21.5,47 r180 top
R83 "10K" RES-0603 26,49.775 r270 top
R84 "10K" RES-0603 32,50.8 r90 top
R85 "150R" RES-1210 30.5,47 r180 top
R86 "10K" RES-0603 35,49.775 r270 top
R87 "10K" RES-0603 38,53.775 r270 top
R88 "10K" RES-0603 47,53.775 r270 top
R89 "10K" RES-0603 38,56.775 r90 top
R90 "10K" RES-0603 47,56.775 r90 top
R91 "27K" RES-0603 38,50.775 r90 top
R92 "27K" RES-0603 47,50.775 r90 top
R93 "10K" RES-0603 41,50.8 r90 top
R94 "150R" RES-1210 39.5,47 r180 top
R95 "10K" RES-0603 44,49.775 r270 top
R96 "10K" RES-0603 50,50.7 r90 top
R97 "150R" RES-1210 48.5,47 r180 top
R98 "10K" RES-0603 53,49.775 r270 top
R99 "100R" RES-0603 55,53.225 r270 top
R100 "10K" RES-0603 30,43.5 r90 top
R101 "10K" RES-0603 34,43.5 r270 top
R102 "100R" RES-0603 57,53.225 r90 top
R103 "2K" RES-0603 53,65 r270 top
R104 "1K" RES-0603 53.5,44.025 r270 top
R105 "100R" RES-0603 59,53.225 r270 top
R106 "10K" RES-0603 38,43.5 r90 top
R107 "10K" RES-0603 42,43.5 r270 top
R108 "100R" RES-0603 61,53.225 r90 top
R109 "2K" RES-0603 61,65 r270 top
R110 "1K" RES-0603 64.2,42.7 r0 top
U1 "78L15" SOT-89-3_L4.5-W2.5-P1.50-LS4.1-BR 21,32.251 r180 top
U2 "RY9320AT6" SOT23-6 9.55,21.05 r0 top
U3 "LM1117S-3.3" SOT-223-3_L6.7-W3.7-P2.30-LS7.0-BR_2 11.05,30.12 r270 top
U4 "EL3H7(C)(TA)-G" SSOP-4 65.635,47.825 r270 top
U5 "EL3H7(C)(TA)-G" SSOP-4 71.635,47.825 r270 top
U6 "EL3H7(C)(TA)-G" SSOP-4 77.635,47.825 r270 top
U7 "EL3H7(C)(TA)-G" SSOP-4 83.635,47.825 r270 top
U8 "EL3H7(C)(TA)-G" SSOP-4 89.635,47.825 r270 top
U9 "EL3H7(C)(TA)-G" SSOP-4 95.635,47.825 r270 top
U10 "EL3H7(C)(TA)-G" SSOP-4 101.635,47.825 r270 top
U11 "EL3H7(C)(TA)-G" SSOP-4 107.635,47.825 r270 top
U12 "LM324PWR" TSSOP-14 58.95,46.05 r0 top
U13 "MAX485ESA" SOIC-08 69.345,30.8 r270 top
U14 "MAX485ESA" SOIC-08 75.595,30.8 r270 top

## Footprints (in the part's own frame and the unit in brackets; to place one, negate y for a bottom-side part, rotate by r counter-clockwise, add the part's x,y. Pads: shape width x height; smd on the part's side, far side on the other; paste and mask are expansions set on the pad)
AX1RCX [mm]
  round 2 hole 1.3: 1(-6,-2) 2(6,-2) 3(0,0) 4(-6,-14.2) 5(6,-14.2)
  silkscreen extent -7.5,-17.6 7.5,1.2, body extent -7.5,-17.6 7.5,1.2, height 15.41
BPDDI-30MM-10 [mm] "BARRA DE PINOS DUPLA DUPLO ISOLADOR 30MM 10 VIAS"
  rect 1.7x1.7 hole 1.1: 1(-1.27,5.08)
  round 1.7 hole 1.1: 2(1.27,5.08) 3(-1.27,2.54) 4(1.27,2.54) 5(-1.27,0) 6(1.27,0) 7(-1.27,-2.54) 8(1.27,-2.54) 9(-1.27,-5.08) 10(1.27,-5.08)
  silkscreen extent -2.54,-6.35 2.54,6.35, body extent -2.54,-6.35 2.54,6.35, height 27
BPDDI-30MM-20 [mm] "BARRA DE PINOS DUPLA DUPLO ISOLADOR 30MM 20 VIAS"
  rect 1.7x1.7 hole 1.1: 1(-1.27,11.43)
  round 1.7 hole 1.1: 2(1.27,11.43) 3(-1.27,8.89) 4(1.27,8.89) 5(-1.27,6.35) 6(1.27,6.35) 7(-1.27,3.81) 8(1.27,3.81) 9(-1.27,1.27) 10(1.27,1.27) 11(-1.27,-1.27) 12(1.27,-1.27) 13(-1.27,-3.81) 14(1.27,-3.81) 15(-1.27,-6.35) 16(1.27,-6.35) 17(-1.27,-8.89) 18(1.27,-8.89) 19(-1.27,-11.43) 20(1.27,-11.43)
  silkscreen extent -2.54,-12.7 2.54,12.7, body extent -2.54,-12.7 2.54,12.7, height 27
CAP-0603 [mm]
  rect 0.65x1 smd: 1(-0.775,0) 2(0.775,0)
  silkscreen extent -0.2,-0.5 0.2,0.5, body extent -0.88,-0.48 0.88,0.48, height 0.94
CAP-1206 [mm]
  rect 1.1x1.7 smd: 1(-1.55,0.025) 2(1.55,-0.025)
  silkscreen extent -0.63,-0.87 0.63,0.87, body extent -1.6,-0.75 1.6,0.81, height 1.68
CAP-TH_BD6.3-P2.50-D1.0-FD [mm]
  round 1.6 hole 1: 1(-1.27,0) 2(1.27,0)
  silkscreen extent -3.15,-3.15 3.17,3.15
DO214-AA [mm]
  rect 2.16x2.26 smd: 1(-2.45,0) 2(2.45,0)
  silkscreen extent -3,-2 4.1,2.1, body extent -2.65,-1.85 2.65,1.85, height 2.2
FIDUCIAL [mm]
  round 1 smd: ""(0,0)
IND-SMD_2P-L5.0-W5.0 [mm]
  rect 1.6x4.2 smd: 1(-1.9,0) 2(1.9,0)
  silkscreen extent -0.71,-2.61 0.71,2.57
PEMN1-05 [mm]
  round 1.8 hole 1: 1(-5,0) 2(-2.5,0) 3(0,0) 4(2.5,0) 5(5,0)
  silkscreen extent -7.5,-9.2 7.5,2.3, body extent -7.45,-9.2 7.45,2.3, height 6.15
PEMN1-06 [mm]
  round 1.8 hole 1: 1(-6.25,0) 2(-3.75,0) 3(-1.25,0) 4(1.25,0) 5(3.75,0) 6(6.25,0)
  silkscreen extent -8.75,-9.2 8.75,2.3, body extent -8.7,-9.2 8.7,2.3, height 6.15
PTC-0603 [mm]
  rrect10% 0.65x0.9 smd: 1(-0.775,0) 2(0.775,0)
  silkscreen extent -0.2,-0.5 0.2,0.5, body extent -0.83,-0.43 0.82,0.42, height 0.84
PTC-1206 [mm]
  rrect10% 1.1x1.7 smd: 1(-1.55,0) 2(1.55,0)
  silkscreen extent -0.63,-0.87 0.63,0.87, body extent -1.6,-0.79 1.6,0.79, height 0.75
RES-0603 [mm]
  rect 0.65x0.9 smd: 1(-0.775,0) 2(0.775,0)
  silkscreen extent -0.2,-0.5 0.2,0.5, body extent -0.8,-0.4 0.8,0.4, height 0.42
RES-1206 [mm]
  rect 1.1x1.7 smd: 1(-1.55,0.025) 2(1.55,-0.025)
  silkscreen extent -0.63,-0.87 0.63,0.87, body extent -1.6,-0.83 1.6,0.83, height 0.53
RES-1210 [mm]
  rect 1.3x2.7 smd: 1(-1.5,0) 2(1.5,0)
  silkscreen extent -0.5,-1.2 0.5,1.2, body extent -1.6,-1.25 1.6,1.25, height 0.6
SMA [mm]
  rect 1.5x1.4 smd: 1(-1.75,0) 2(1.75,0)
  silkscreen extent -2.25,-1.35 2.8,1.8, body extent -2.49,-1.45 2.49,1.39, height 2.57
SOD123 [mm]
  rect 0.85x0.85 smd: 1(-1.675,0) 2(1.675,0)
  silkscreen extent -1.5,-0.9 2.1,1.1, body extent -1.85,-0.8 1.85,0.8, height 1.25
SOIC-08 [mm]
  rect 1.6x0.75 smd: 1(-2.7,1.905) 2(-2.7,0.635) 3(-2.7,-0.635) 4(-2.7,-1.905) 5(2.7,-1.905) 6(2.7,-0.635) 7(2.7,0.635) 8(2.7,1.905)
  silkscreen extent -2.8,-2.5 1.5,3, body extent -3,-2.45 3,2.45, height 1.56
SOT23-3 [mm]
  rect 0.6x0.7 smd: 1(-0.95,-1.05) 2(0.95,-1.05) 3(0,1.05)
  silkscreen extent -1.3,-0.35 1.3,0.25, body extent -1.5,-1.25 1.5,1.25, height 1.05
SOT23-6 [mm]
  rect 0.8x0.63 smd: 1(-1.2,0.95) 2(-1.2,0) 3(-1.2,-0.95) 4(1.2,-0.95) 5(1.2,0) 6(1.2,0.95)
  silkscreen extent -1.6,-1.6 1.2,2.1, body extent -1.4,-1.45 1.4,1.45, height 1.45
SOT-89-3_L4.5-W2.5-P1.50-LS4.1-BR [mm]
  rect 1.9x0.7 smd paste-100 mask+0.051: 1(1.25,-1.501) 3(1.25,1.501)
  oval 3.5x2 smd paste-100 mask+0.051: 2(-1.25,0)
  rect 2.1x0.7 smd paste-100 mask+0.051: 2(1.151,0)
  silkscreen extent -1.85,-2.61 1.68,2.3, body extent -2.25,-2.25 1.85,2.25, height 1.5
SOT-223-3_L6.7-W3.7-P2.30-LS7.0-BR_2 [mm]
  rect 2.34x0.98 smd: 1(2.87,-2.3) 2(2.87,0) 3(2.87,2.3)
  rect 2.34x3.6 smd: 4(-2.87,0)
  silkscreen extent -1.47,-3.33 1.47,3.33, body extent -3.76,-3.25 3.26,3.25, height 1.6
SSOP-4 [mm]
  rect 1.5x0.6 smd: 1(-3.175,0.635) 2(-3.175,-0.635) 3(3.175,-0.635) 4(3.175,0.635)
  silkscreen extent -2.2,-1.37 2.2,1.35, body extent -3.5,-1.35 3.5,1.35, height 1.93
STLZ950-02G-H [mm]
  round 2.8 hole 1.6: 1(-2.54,0) 2(2.54,0)
  silkscreen extent -4.98,-10 4.98,2, body extent -5.08,-17.3 5.08,2, height 15
STLZ950-06G-H [mm]
  round 2.8 hole 1.6: 1(-12.7,0) 2(-7.62,0) 3(-2.54,0) 4(2.54,0) 5(7.62,0) 6(12.7,0)
  silkscreen extent -15.14,-10 15.14,2, body extent -15.24,-17.3 15.24,2, height 15
STLZ950-10G-H [mm]
  round 2.8 hole 1.6: 1(-22.86,0) 2(-17.78,0) 3(-12.7,0) 4(-7.62,0) 5(-2.54,0) 6(2.54,0) 7(7.62,0) 8(12.7,0) 9(17.78,0) 10(22.86,0)
  silkscreen extent -25.3,-10 25.3,2, body extent -25.4,-17.3 25.4,2, height 15
SW-SMD_SHOU_MST23D18G2 [mm]
  rect 1.4x2 smd paste+0 mask+0.051: 1(-4,-3) 2(-2,-3) 3(2,-3) 4(4,-3) 5(4,3) 6(2,3) 7(-2,3) 8(-4,3)
  silkscreen extent -6.5,-2.8 6.5,1.75, body extent -6.35,-3.21 6.65,3.59, height 5.5
TSSOP-14 [mm]
  rect 1.45x0.45 smd: 1(-2.95,1.95) 2(-2.95,1.3) 3(-2.95,0.65) 4(-2.95,0) 5(-2.95,-0.65) 6(-2.95,-1.3) 7(-2.95,-1.95) 8(2.95,-1.95) 9(2.95,-1.3) 10(2.95,-0.65) 11(2.95,0) 12(2.95,0.65) 13(2.95,1.3) 14(2.95,1.95)
  silkscreen extent -3.25,-2.5 1.75,3.25, body extent -3.2,-2.5 3.2,2.5, height 1.1

## Part data
C1 C2 C7 C8 C9 C14: library part CAP-22uF/25V-1206-X5R-MLCC, "25V 22uF X5R ±10% 1206 Multilayer Ceramic Capacitors MLCC - SMD/SMT ROHS", LCSC=C12891
C3 C4 C10 C12 C15 C17: library part CAP-10uF/16V-0603-X5R, "16V 10uF X5R ±20% 0603 Multilayer Ceramic Capacitors MLCC - SMD/SMT ROHS", LCSC=C92487
C5 C11 C13 C16 C18 C19 C20 C21 C22 C23 C24 C25 C26 C27 C28 C29 C30 C31 C32 C33 C34 C35 C36 C37 C38 C43 C45 C47 C48: library part CAP-100nF/50V-0603-X7R-MLCC, "50V 100nF X7R ±10% 0603 Multilayer Ceramic Capacitors MLCC - SMD/SMT ROHS", LCSC=C14663
C6: library part CAP-100uF/35V-ELET-D10xL20mm_1, "100uF 35V Aluminum Electrolytic Capacitors Through Hole,D6.3xL11mm 2000hrs@105℃", LCSC=C109392
C44 C46: library part CAP-22nF/50V-0603-X7R-MLCC, "50V 22nF X7R ±10% 0603 Ceramic Capacitors ROHS", LCSC=C1589
D1 D47 D48: "24.6A 600W@8/20us 24.4V 19.2V Bidirectional 15V SMB(DO-214AA) ESD and Surge Protection (TVS/ESD) ROHS", LCSC=C2760879
D2 D4: "65.3A 600W 9.2V 6.4V Unidirectional 5V DO-214AA ESD and Surge Protection (TVS/ESD) ROHS", LCSC=C83333
D3 D37 D38 D41 D42 D45 D46: "A 600W@8/20us 24.4V 33V Bidirectional 15V SMB(DO-214AA) ESD and Surge Protection (TVS/ESD) ROHS", LCSC=C3001986
D5 D6 D7 D11 D12 D13 D21 D22 D25 D26 D29 D30 D33 D34: "DIODE-ZENER-5V1-500mV"
D8 D9 D10 D14 D15 D16: "C20754788", LCSC=C20754788
D17 D18 D19 D20 D23 D24 D27 D28 D31 D32: "1A 4ns 75V Independent 1V@50mA 150mA SOD-123 Single Diodes RoHS"
D35 D36 D39 D40 D43 D44: "30V Dual 200mA 800mV@100mA SOT-23 Schottky Barrier Diodes (SBD) ROHS", LCSC=C916425
D49 D50: "400W@8/20us Bidirectional SOT-23 ESD and Surge Protection (TVS/ESD) ROHS", LCSC=C22363671
FB1 FB2 FB3 FB4 FB5 FB6 FB7 FB8 FB9 FB10 FB11 FB12 FB13: "FERRITE BEAD 120Ω 0603 1LN", LCSC=C14709
J1 J2 J4: "CONECTOR PHOENIX MECANO 10 VIAS PASSO 5,08mm VERDE 90º"
J3: "CONECTOR PHOENIX MECANO 2 VIAS PASSO 5,08mm VERDE 90º"
J5: "CONECTOR PHOENIX MECANO 6 VIAS PASSO 5,08mm VERDE 90º"
J6: "Conector PTH passo 2,5mm - Montagem em placa - 90º - 250VCA - 3A - 10mOhms"
J7: library part PEMN1-06, "Conector PTH passo 2,5mm - Montagem em placa - 90º - 250VCA - 3A - 10mOhms"
K1 K3: "BARRA DE PINOS DUPLA 2,54mm 20 VIAS 180º DUPLO ISOLADOR PINO 30mm"
K2: "BARRA DE PINOS DUPLA 2,54mm 10 VIAS 180º DUPLO ISOLADOR PINO 30mm"
K4 K5: "RELÉ-METALTEX-BOBINA 24V-15A-SPDT"
K6 K7 K8 K9 K10 K11: "SLIDE-SWITCH-SP3T", JLCPCB Part Class="Extended Part", LCSC=C7507443, Manufacturer="SHOU HAN(首韩)", Contributor=lcsc, Manufacturer Part=MST-23D18G2-BD, spicePre=U, spiceSymbolName=MST-23D18G2-BD, Supplier=LCSC, Supplier Part=C7507443
L1: library part FIXED-INDUCTOR-SMD-10uH-5X5mm-2A-15mΩ_1, "2A 10uH ±20% Magnetic Shielded Inductor 2A SMD,5x5mm Fixed Inductors RoHS", LCSC=C9389
PSW1 PSW2 PSW3 PSW4 PSW5 PSW6: "PTC RESET FUSE 30V 200mA 1206"
PSW7 PSW8 PSW9 PSW10: "30V 100mA 100A 270mA 1206 Resettable Fuses ROHS", LCSC=C269108
PTC1 PTC10 PTC11: library part PTC-FUSE-30V-500mA-1206, "30V 500mA 100A 1A 150mΩ 1206 PTC Resettable Fuses ROHS", LCSC=C720075
PTC2 PTC3 PTC4 PTC5 PTC6 PTC7 PTC8 PTC9: library part PTC-FUSE-60V-10mA-0603, "60V 10mA 20A 50mA 15Ω 0603 PTC Resettable Fuses ROHS", LCSC=C914088
Q1 Q2 Q3 Q7 Q8 Q9: "MOSFET P-CH 30V 6A SOT-223", LCSC=C49066900
Q4 Q5 Q6 Q10 Q11 Q12 Q13 Q14 Q15 Q16: library part TRANSISTOR-BC846B,215-SOT23, "65V 200@10mA,5V 250mW 100mA NPN SOT-23 Bipolar (BJT) ROHS", LCSC=C87062
R1: library part RES-69.8K-1%-100mW-0603_1, "100mW Thick Film Resistor 75V ±100ppm/℃ ±1% 69.8K 0603 Chip Resistor - Surface Mount ROHS", LCSC=C2907025
R2: library part RES-9.53K-1%-100mW-0603, "100mW Thick Film Resistor 75V ±100ppm/℃ ±1% 9.53K 0603 Chip Resistor - Surface Mount ROHS", LCSC=C23127
R3 R4 R5 R15 R16 R17: library part RES-100K-1%-100mW-0603, "100mW Thick Film Resistor 75V ±100ppm/℃ ±1% 100kΩ 0603 Chip Resistor - Surface Mount ROHS", LCSC=C14675
R6 R7 R8 R18 R19 R20 R33 R34 R35 R36 R41 R42 R43 R44 R49 R50 R51 R52 R57 R58 R59 R60: library part RES-2K-1%-250mW-1206, "250mW Thick Film Resistor 200V ±100ppm/℃ ±5% 2kΩ 1206 Chip Resistor - Surface Mount ROHS", LCSC=C2907466
R9 R10 R11 R12 R13 R14 R21 R22 R23 R24 R25 R26 R28 R30 R37 R38 R45 R46 R53 R54 R61 R62 R63 R64 R65 R66 R69 R71 R72 R74 R75 R76 R77 R78 R81 R83 R84 R86 R87 R88 R89 R90 R93 R95 R96 R98 R100 R101 R106 R107: library part RES-10K-1%-100mW-0603, "100mW Thick Film Resistor 75V ±100ppm/℃ ±1% 10kΩ 0603 Chip Resistor - Surface Mount ROHS", LCSC=C98220
R27 R29 R104 R110: library part RES-1K-1%-100mW-0603, "100mW Thick Film Resistor 75V ±100ppm/℃ ±1% 1kΩ 0603 Chip Resistor - Surface Mount ROHS", LCSC=C22548
R31 R32 R39 R40 R47 R48 R55 R56 R103 R109: library part RES-2K-1%-100mW-0603, "100mW Thick Film Resistor 75V ±100ppm/℃ ±2% 1kΩ 0603 Chip Resistor - Surface Mount ROHS", LCSC=C22975
R67 R68 R79 R80 R91 R92: library part RES-27K-1%-100mW-0603, "100mW Thick Film Resistor 75V ±100ppm/℃ ±1% 10kΩ 0603 Chip Resistor - Surface Mount ROHS", LCSC=C98220
R70 R73 R82 R85 R94 R97: library part RES-150R-1%-125mW-1210, "500mW 150Ω 200V ±100ppm/℃ Thick Film Resistor ±5% 1210 Chip Resistor - Surface Mount ROHS", LCSC=C620692
R99 R102 R105 R108: library part RES-100R-1%-100mW-0603, "100mW Thick Film Resistor 75V ±100ppm/℃ ±1% 100Ω 0603 Chip Resistor - Surface Mount ROHS", LCSC=C105588
U1: "3-Terminal Positive Voltage Regulator - SOT89", LCSC=C5309538
U2: "500kHz Buck Adjustable 2A SOT-23-6 Voltage Regulators - DC DC Switching Regulators RoHS", LCSCC=C2962442
U3: LCSC=C126027
U4 U5 U6 U7 U8 U9 U10 U11: "80V 3.75kV 50mA 200mV@10mA,1mA 6V 1.2V DC SSOP-4-1.27mm Transistor, Photovoltaic Output Optoisolators ROHS", LCSC=C92243
U12: "Quad 20nA 0.5V/us 1.2MHz TSSOP-14 Operational Amplifier ROHS", LCSC=C7942
U13 U14: "Low-Power, Slew-Rate-Limited RS-485/RS-422 Transceivers", LCSC=C5279041

## Free pads (board coordinates)
  round 10 hole 3.5: ""(5,5) ""(5,75) ""(120,5) ""(120,75)
  round 7 hole 3: ""(5,14) ""(5,66) ""(120,14) ""(120,66)

## Via types
v1: diameter 0.7, hole 0.4, Top Layer to Bottom Layer, tented both sides, 192 vias

## Nets (pads, with @x,y where several pads share a name; then routed paths per layer and width w, separated by ;. In a path a pad name is that pad's centre, name@x,y a point inside that pad or via, vN(x,y) a via of type N, cw(c..) or ccw(c..) an arc to the next point about the centre after c; other vN are vias at no path point)
3,3V: C12.2 C13.2 D4.2 FB1.1 R31.2 R32.2 R39.2 R40.2 R47.2 R48.2 R55.2 R56.2 U3.2 U3.4 | length 60.6
  Top Layer w0.6: D4.2@9.5,37.5 9.5,36 v1(10.25,35.25) 11,34.5 11,33.04 U3.4@11.05,32.99 ; U3.2@11.05,27.25 U3.4@11.05,32.99 ; FB1.1@15.225,34.7 15.238,34.687 15.238,31.263 C12.2@15.25,31.25 ; C13.2@15.25,33 11.06,33 U3.4@11.05,32.99 ; R31.2@68,46.55 v1(69,46.55) R32.2@74,46.55 R39.2@80,46.55 R40.2@86,46.55 R47.2@92,46.55 R48.2@98,46.55 R55.2@104,46.55 R56.2@110,46.55
3,3VA: C14.2 C15.2 C16.2 D35.2 D36.2 D39.2 D40.2 D43.2 D44.2 FB1.2 R63.2 R64.2 R75.2 R76.2 R87.2 R88.2 | length 30.2
  Top Layer w0.4: R63.2@2,53 v1(2.9,53) ; v1(5,56) 5.05,56.05 D35.2@5.9,56.05 ; v1(8,45.9) 8,45 8.4,44.6 11.2,44.6 11.6,44.2 11.6,39.8 11.9,39.5 C14.2@13.25,39.5 13.25,37.875 13.375,37.75 ; R64.2@11.054,52.968 v1(11.954,52.968) ; C15.2@12.5,37.75 13.375,37.75 ; v1(14,56) 14.05,56.05 D36.2@14.9,56.05 ; FB1.2@16.775,34.7 16.775,36.225 15.25,37.75 C16.2@14.25,37.75 13.375,37.75 ; v1(19.046,53.032) R75.2@19.946,53.032 ; v1(23,56) 23.05,56.05 D39.2@23.9,56.05 ; v1(28.146,53.032) R76.2@29.046,53.032 ; v1(32,56) 32.05,56.05 D40.2@32.9,56.05 ; v1(37.046,53.032) R87.2@37.946,53.032 ; v1(41,56) 41.05,56.05 D43.2@41.9,56.05 ; v1(46.046,53.032) R88.2@46.946,53.032 ; v1(50,56) 50.05,56.05 D44.2@50.9,56.05
5V: C7.2 C8.2 C9.2 C10.2 C11.2 C47.2 C48.2 D2.2 K3.19 K3.20 L1.2 R1.2 U3.3 U13.8 U14.8 | length 115.8
  Top Layer w0.3: C47.2@72,26 71.4,26 71.2,26.2 71.2,28.05 U13.8@71.25,28.1 72.1,28.1 72.323,27.877 72.323,27.377 v1(72.4,27.3) ; U14.8@77.5,28.05 77.5,26.2 77.7,26 C48.2@78.3,26 ; U14.8@77.5,28.1 78.3,28.1 78.523,27.877 78.523,27.377 v1(78.6,27.3)
  Top Layer w0.5: U3.3@13.35,27.25 C10.2@15.225,27.25 ; C11.2@15.25,29 15.238,28.988 15.238,27.262 C10.2@15.225,27.25 ; D2.2@19.5,22.25 v1(18,22.25) L1.2@16.55,22.25 ; v1(25.7,18.2) 25.675,18.225 23.775,18.225 C7.2@23.75,18.25 C8.2@21.25,18.25 C9.2@18.75,18.25 R1.2@16.5,18.25 16.5,22.2 L1.2@16.55,22.25 ; C10.2@15.225,27.25 15.225,26.275 16.55,24.95 L1.2@16.55,22.25
  Bottom Layer w0.5: v1(25.7,18.2) 28.6,15.3 69.6,15.3 72.4,18.1 v1(72.4,27.3) v1(78.6,27.3)
  Bottom Layer w1: K3.19@2.23,19.57 K3.20@4.77,19.57 15.32,19.57 v1(18,22.25)
15V: C2.2 C3.2 C4.2 C17.2 C18.2 D1.2 R99.2 R105.2 U1.1 U12.4 | length 77.5
  Top Layer w0.3: R99.2@55,52.45 55,51.176 55.176,51 58.9,51 ; U12.4@56,46.05 58.55,46.05 v1(58.9,46.4) 58.9,50 ; C17.2@58,50 58.9,50 ; R105.2@59,52.45 58.9,52.35 58.9,51 ; C18.2@60,50 58.9,50 ; 58.9,50 58.9,51
  Top Layer w0.4: U1.1@19.75,33.752 19.75,34.751 ; C4.2@19.75,35.75 19.75,34.751 ; 23,34.5 22.749,34.751 ; D1.2@26.75,30.5 26.75,32.55 27.1,32.9 C2.2@27.2,32.9 25.35,32.9 25,33.25 C3.2@25,34.45 ; v1(28.7,38.4) 28.7,34.8 28.35,34.45 C3.2@25,34.45 ; 19.75,34.751 22.749,34.751 ; 22.749,34.751 23.05,34.45 C3.2@25,34.45
  Bottom Layer w0.4: v1(28.7,38.4) 28.7,43.2 29.7,44.2 48.6,44.2 49.5,45.1 52,45.1 53.9,43.2 58.4,43.2 59.15,43.95 59.15,44.389 59.2,44.439 59.2,46.166 58.966,46.4 v1(58.9,46.4)
CM0: J5.2 K4.3 | length 22
  Bottom Layer w1: K4.3@88,31 88,12.38 J5.2@90.38,10
CM1: J5.5 K5.3 | length 21.9
  Bottom Layer w1: K5.3@104,31.2 104,27.6 105.62,25.98 J5.5@105.62,10
COM1_A: J4.7 PSW7.2 | length 10.4
  Top Layer w0.5: J4.7@59.62,10 60,10 60,10.38 61.62,12 65,12 67.15,14.15 67.675,14.15 PSW7.2@67.975,14.45
COM1_B: J4.8 PSW8.2 | length 8.8
  Top Layer w0.5: J4.8@64.7,10 67,12.3 69.95,12.3 70.975,13.325 PSW8.2@70.975,14.45
COM2_A: J4.9 PSW9.2 | length 6.7
  Top Layer w0.5: J4.9@69.78,10 70.402,10 71.602,11.2 71.8,11.2 73.975,13.375 PSW9.2@73.975,14.45
COM2_B: J4.10 PSW10.2 | length 5.3
  Top Layer w0.5: J4.10@74.86,10 76.975,12.115 PSW10.2@76.975,14.45
CTS: J7.5 K1.12 | length 31.6
  Top Layer w0.3: v1(111.9,45.4) v1(120.7,45.4)
  Bottom Layer w0.3: K1.12@111.27,38.27 111.27,44.77 v1(111.9,45.4) ; J7.5@116,56.75 119.65,56.75 120.7,55.7 v1(120.7,45.4)
EED0: J2.10 R33.1 | length 4.2
  Top Layer w0.5: J2.10@66.14,70 68.025,68.115 R33.1@68.025,66.55
EED1: J2.9 R35.1 | length 4.8
  Top Layer w0.5: J2.9@71.22,70 71.6,70 74.025,67.575 R35.1@74.025,66.55
EED2: J2.8 R41.1 | length 5.6
  Top Layer w0.5: J2.8@76.3,70 76.4,70 77.871,68.53 78.87,68.53 79.9,67.5 79.9,66.675 R41.1@80.025,66.55
EED3: J2.7 R43.1 | length 9
  Top Layer w0.5: v1(84.6,66.5) 84.65,66.55 R43.1@86.025,66.55
  Bottom Layer w0.5: J2.7@81.38,70 81.38,66.23 81.673,65.937 84.345,65.937 84.562,66.155 84.562,66.462 v1(84.6,66.5)
EED4: J2.6 R49.1 | length 10.6
  Top Layer w0.5: v1(90.7,66.6) 91.975,66.6 R49.1@92.025,66.55
  Bottom Layer w0.5: J2.6@86.46,70 86.46,66.34 87.4,65.4 90.369,65.4 90.662,65.693 90.662,66.562 v1(90.7,66.6)
EED5: J2.5 R51.1 | length 11.8
  Top Layer w0.5: v1(96.7,66.6) 96.725,66.575 97.95,66.575 97.975,66.6 R51.1@98.025,66.55
  Bottom Layer w0.5: J2.5@91.54,70 91.65,69.89 91.65,67.85 92.3,67.2 92.3,65.7 92.8,65.2 96.4,65.2 96.7,65.5 v1(96.7,66.6)
EED6: J2.4 R57.1 | length 13.1
  Top Layer w0.5: v1(102.7,66.6) 103.975,66.6 R57.1@104.025,66.55
  Bottom Layer w0.5: J2.4@96.62,70 96.7,69.92 96.7,68.2 98,66.9 98,65.2 98.5,64.7 102,64.7 102.7,65.4 v1(102.7,66.6)
EED7: J2.3 R59.1 | length 12.4
  Top Layer w0.5: v1(108.8,66.6) 109.975,66.6 R59.1@110.025,66.55
  Bottom Layer w0.5: J2.3@101.7,70 104,67.7 104,66 104.7,65.3 108.4,65.3 108.762,65.662 108.762,66.562 v1(108.8,66.6)
ENA0: J1.10 PTC2.1 | length 6.1
  Top Layer w0.4: PTC2.1@10,66.775 10,69.5 10.5,70 J1.10@13.14,70
ENA1: J1.9 PTC3.1 | length 5.2
  Top Layer w0.4: PTC3.1@16,66.775 16,69.5 16.5,70 J1.9@18.22,70
ENA2: J1.8 PTC4.1 | length 3.8
  Top Layer w0.4: PTC4.1@22,66.775 22,68.472 23.3,69.772 J1.8@23.3,70
ENA3: J1.7 PTC5.1 | length 3.4
  Top Layer w0.4: PTC5.1@28,66.775 28,67.75 28.38,68.13 J1.7@28.38,70
ENA4: J1.6 PTC6.1 | length 3.4
  Top Layer w0.4: J1.6@33.46,70 33.5,69.96 33.5,68.25 34,67.75 PTC6.1@34,66.775
ENA5: J1.5 PTC7.1 | length 3.8
  Top Layer w0.4: J1.5@38.54,70 38.54,69.46 40,68 PTC7.1@40,66.775
ESA0: D47.2 J1.3 PTC8.1 R103.2 | length 17.7
  Top Layer w0.4: D47.2@49,61 51,61 51.775,61.775 PTC8.1@53,61.775 v1(53,63) R103.2@53,64.225
  Bottom Layer w0.4: J1.3@48.7,70 48.7,63.7 49.4,63 v1(53,63)
ESA1: D48.2 J1.2 PTC9.1 R109.2 | length 20.4
  Top Layer w0.4: J1.2@53.78,70 53.78,68.22 54.1,67.9 59.1,67.9 59.4,67.6 59.4,63.4 59.8,63 61,63 ; D48.2@57,61 59,61 59.775,61.775 PTC9.1@61,61.775 61,63 ; R109.2@61,64.225 61,63
ESD0: J4.1 PSW1.2 | length 5.5
  Top Layer w0.7: J4.1@29.14,10 29.14,13.39 29.75,14 30.95,14 PSW1.2@31,13.95
ESD1: J4.2 PSW2.2 | length 5.1
  Top Layer w0.7: J4.2@34.22,10 37,12.78 PSW2.2@37,13.95
ESD2: J4.3 PSW3.2 | length 5.9
  Top Layer w0.7: J4.3@39.3,10 39.863,10 42.68,12.817 42.68,13.75 42.88,13.95 PSW3.2@42.977,13.95
ESD3: J4.4 PSW4.2 | length 6.8
  Top Layer w0.5: J4.4@44.38,10 45,10 47,12 48,12 49,13 PSW4.2@49,13.95
ESD4: J4.5 PSW5.2 | length 8.3
  Top Layer w0.5: J4.5@49.46,10 51.46,12 54,12 54.227,12.227 ; 54.455,12.455 54.227,12.227 ; PSW5.2@54.755,13.95 PSW5.2@55,13.95 55,13 54.227,12.227
ESD5: J4.6 PSW6.2 | length 8.9
  Top Layer w0.5: J4.6@54.54,10 55,10 55,10.46 56.54,12 60,12 61,13 PSW6.2@61,13.95
GND: C1.1 C2.1 C3.1 C4.1 C6.2 C7.1 C8.1 C9.1 C10.1 C11.1 C12.1 C13.1 C14.1 C15.1 C16.1 C17.1 C18.1 C19.1 C20.1 C21.1 C22.1 C31.1 C32.1 C33.1 C34.1 C35.1 C36.1 C37.1 C38.1 C43.1 C44.1 C45.1 C46.1 C47.1 C48.1 D1.1 D2.1 D3.2 D4.1 D8.1 D9.1 D10.1 D14.1 D15.1 D16.1 D35.1 D36.1 D37.1 D38.1 D39.1 D40.1 D41.1 D42.1 D43.1 D44.1 D45.1 D46.1 D47.1 D48.1 D49.3 D50.3 J1.1 J1.4 J3.2 J6.2 J7.6 K2.7 K2.8 K3.17 K3.18 Q4.2 Q5.2 Q6.2 Q10.2 Q11.2 Q12.2 Q13.2 Q14.2 R2.1 R12.1 R13.1 R14.1 R24.1 R25.1 R26.1 R28.2 R30.2 R69.2 R70.1 R72.2 R73.1 R81.2 R82.1 R84.2 R85.1 R93.2 R94.1 R96.2 R97.1 R104.2 R110.2 U1.2 U2.2 U3.1 U4.3 U5.3 U6.3 U7.3 U8.3 U9.3 U10.3 U11.3 U12.11 U13.5 U14.5 | length 15
  Top Layer w0.3: R70.1@5,47 v1(6.25,47) ; v1(5,58) 5.025,57.975 D35.1@5.825,57.975 ; D35.1@5.9,57.95 D35.1@5.95,58 ; v1(14,58) 14.025,57.975 D36.1@14.825,57.975 ; R73.1@14.014,46.984 v1(15.264,46.984) ; D36.1@14.9,57.95 D36.1@14.95,58 ; v1(23,58) 23.025,57.975 D39.1@23.825,57.975 ; D39.1@23.9,57.95 D39.1@23.95,58 ; v1(32,58) 32.025,57.975 D40.1@32.825,57.975 ; D40.1@32.9,57.95 D40.1@32.95,58 ; v1(41,58) 41.025,57.975 D43.1@41.825,57.975 ; D43.1@41.9,57.95 D43.1@41.95,58 ; v1(50,58) 50.025,57.975 D44.1@50.825,57.975 ; D44.1@50.9,57.95 D44.1@50.95,58 ; U12.11@61.9,46.05 63.442,46.05 63.892,46.5 v1(64.25,46.5) ; Q13.2@77.001,38.149 v1(77,39) ; R28.2@83.049,36.599 v1(83.9,36.6) ; Q14.2@88.101,38.049 v1(88.1,38.9) ; v1(91.1,36.5) R30.2@91.951,36.501
  Top Layer w0.5: v1(7.25,21) 7.3,21.05 U2.2@8.35,21.05
GND_ISO: C23.1 C24.1 C25.1 C26.1 C27.1 C28.1 C29.1 C30.1 D19.1 D20.1 D21.1 D22.1 D23.1 D24.1 D25.1 D26.1 D27.1 D28.1 D29.1 D30.1 D31.1 D32.1 D33.1 D34.1 J2.1 J2.2 R37.1 R38.1 R45.1 R46.1 R53.1 R54.1 R61.1 R62.1 | length 54.6
  Top Layer w0.5: D19.1@64.65,61 64.65,59.6 65,59.25 v1(65,59) ; D21.1@65,57 v1(65,59) ; C23.1@65,65.775 v1(65,67) ; R37.1@66.45,59 v1(65,59) ; D20.1@70.65,61 70.65,59.6 71,59.25 v1(71,59) ; D22.1@71,57 v1(71,59) ; C24.1@71,65.775 v1(71,67) ; R38.1@72.45,59 v1(71,59) ; D23.1@76.65,61 76.65,59.6 77,59.25 v1(77,59) ; D25.1@77,57 v1(77,59) ; C25.1@77,65.775 v1(77,67) ; R45.1@78.45,59 v1(77,59) ; D24.1@82.65,61 82.65,59.6 83,59.25 v1(83,59) ; D26.1@83,57 v1(83,59) ; C26.1@83,65.775 v1(83,67) ; R46.1@84.45,59 v1(83,59) ; D27.1@88.65,61 88.65,59.6 89,59.25 v1(89,59) ; D29.1@89,57 v1(89,59) ; C27.1@89,65.775 v1(89,67) ; R53.1@90.45,59 v1(89,59) ; D28.1@94.65,61 94.65,59.6 95,59.25 v1(95,59) ; D30.1@95,57 v1(95,59) ; C28.1@95,65.775 v1(95,67) ; R54.1@96.45,59 v1(95,59) ; D31.1@100.65,61 100.65,59.6 101,59.25 v1(101,59) ; D33.1@101,57 v1(101,59) ; C29.1@101,65.775 v1(101,67) ; R61.1@102.45,59 v1(101,59) ; D32.1@106.65,61 106.65,59.6 107,59.25 v1(107,59) ; D34.1@107,57 v1(107,59) ; C30.1@107,65.775 v1(107,67) ; R62.1@108.45,59 v1(107,59)
NC0: J5.3 K4.5 | length 7.4
  Bottom Layer w1: K4.5@94,16.8 94,13.6 95.116,12.484 95.116,10.344 J5.3@95.46,10
NC1: J5.6 K5.5 | length 7.3
  Bottom Layer w1: K5.5@110,17 110,14 110.7,13.3 J5.6@110.7,10
NetC5_1: C5.1 L1.1 U2.6 | length 7
  Top Layer w0.5: U2.6@10.75,22 C5.1@10.75,23.75 12.2,23.75 12.75,23.2 L1.1@12.75,22.25 12.5,22 U2.6@10.75,22
NetC5_2: C5.2 U2.1 | length 2.4
  Top Layer w0.5: U2.1@8.35,22 8.35,23.35 8.75,23.75 C5.2@9.2,23.75
NetC19_2: C19.2 FB4.2 K7.4 | length 10.3
  Top Layer w0.4: C19.2@16,61 v1(16,61.75) FB4.2@16,62.45
  Bottom Layer w0.4: K7.4@11,57 11,58.5 11.25,58.75 13.5,58.75 14.25,59.5 14.25,61.25 14.75,61.75 v1(16,61.75)
NetC20_2: C20.2 FB5.2 K2.2 | length 16.4
  Top Layer w0.3: C20.2@13.2,54.55 FB5.2@15.1,54.55
  Bottom Layer w0.3: v1(14.2,54.6) 14.2,45.9 16.92,43.18 K2.2@16.92,41.27
NetC21_2: C21.2 FB6.2 K8.4 | length 7.8
  Top Layer w0.4: C21.2@22,61 v1@22,61.75 ; v1(22,61.725) v1@22,61.75 ; FB6.2@22,62.45 v1@22,61.75
  Bottom Layer w0.4: K8.4@20,57 20,61 20.725,61.725 v1(22,61.725)
NetC22_2: C22.2 FB7.2 K2.3 | length 20.3
  Top Layer w0.3: C22.2@22.1,54.55 v1(23.1,54.55) FB7.2@24.1,54.55
  Bottom Layer w0.3: K2.3@19.46,38.73 18.25,39.94 18.25,44.5 23.1,49.35 v1(23.1,54.55)